# Altium PCB Thunderbolt3.pcbdoc (part 1 of 5)
Units mm, origin at the board's own origin, x right, y up, seen from the top; angles counter-clockwise.
Board outline 43.92 x 41.77 mm, 6 copper layers (TopLayer, MidLayer1, MidLayer2, MidLayer3, MidLayer4, BottomLayer); 211 components, 193 nets, 1132 pads, 744 vias.
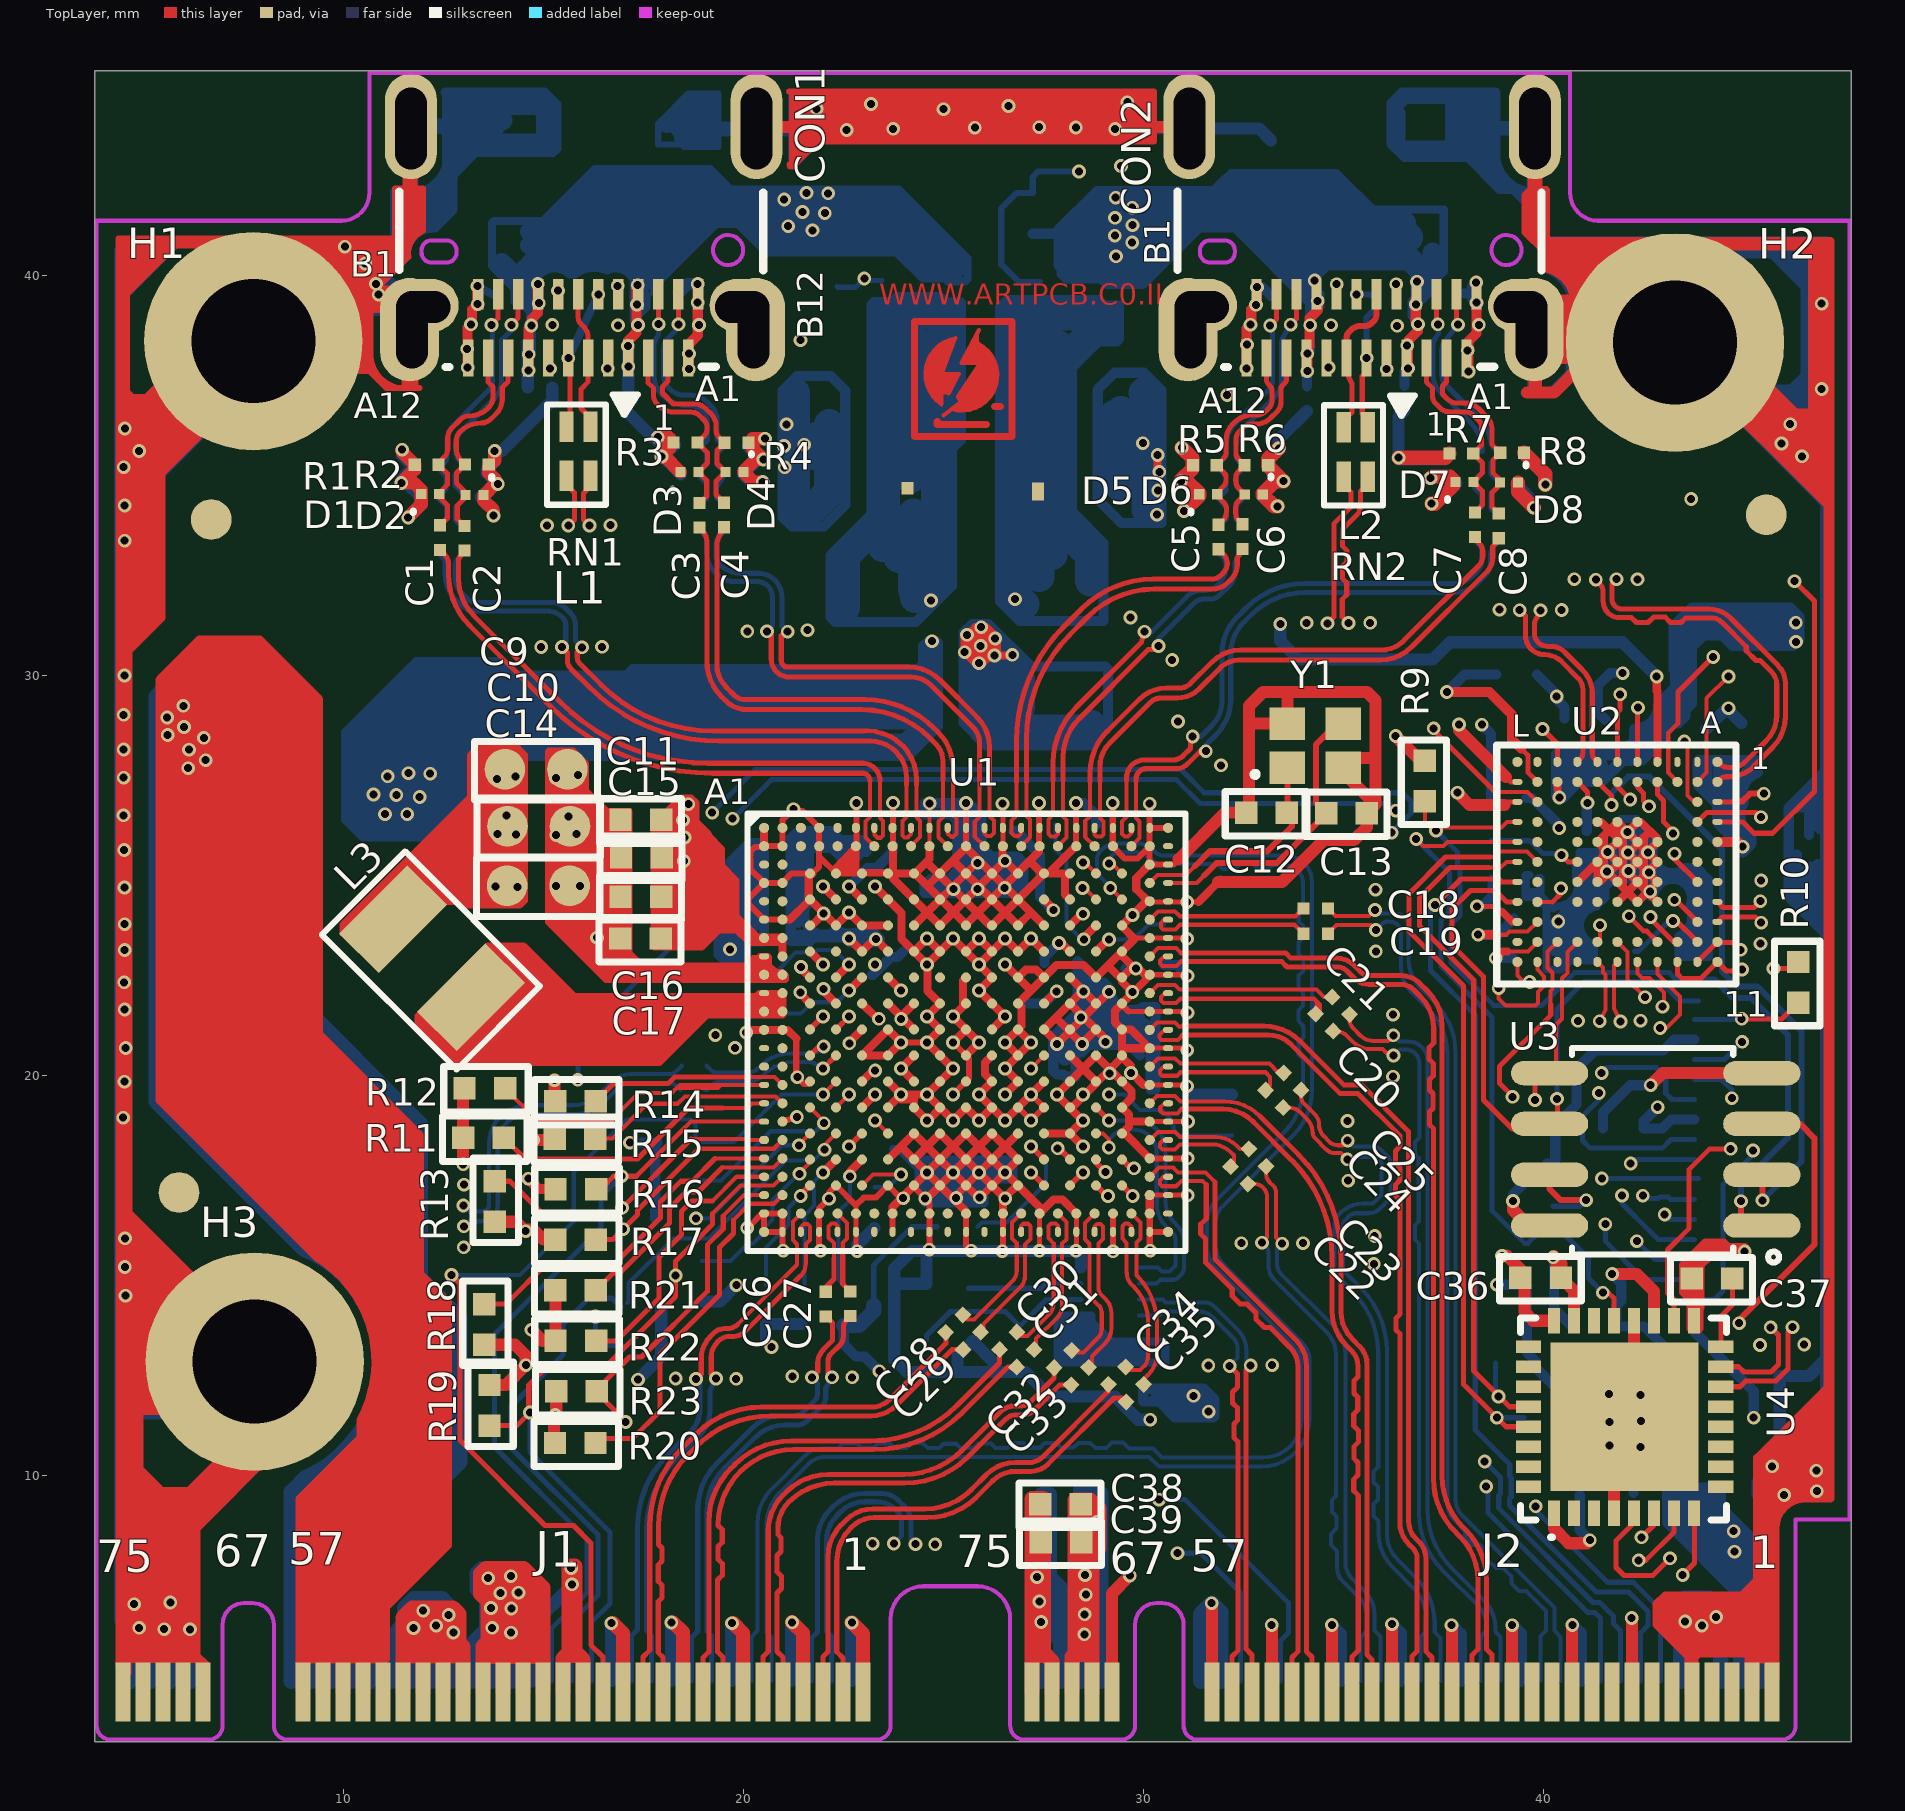
[diagram p0: TopLayer view]
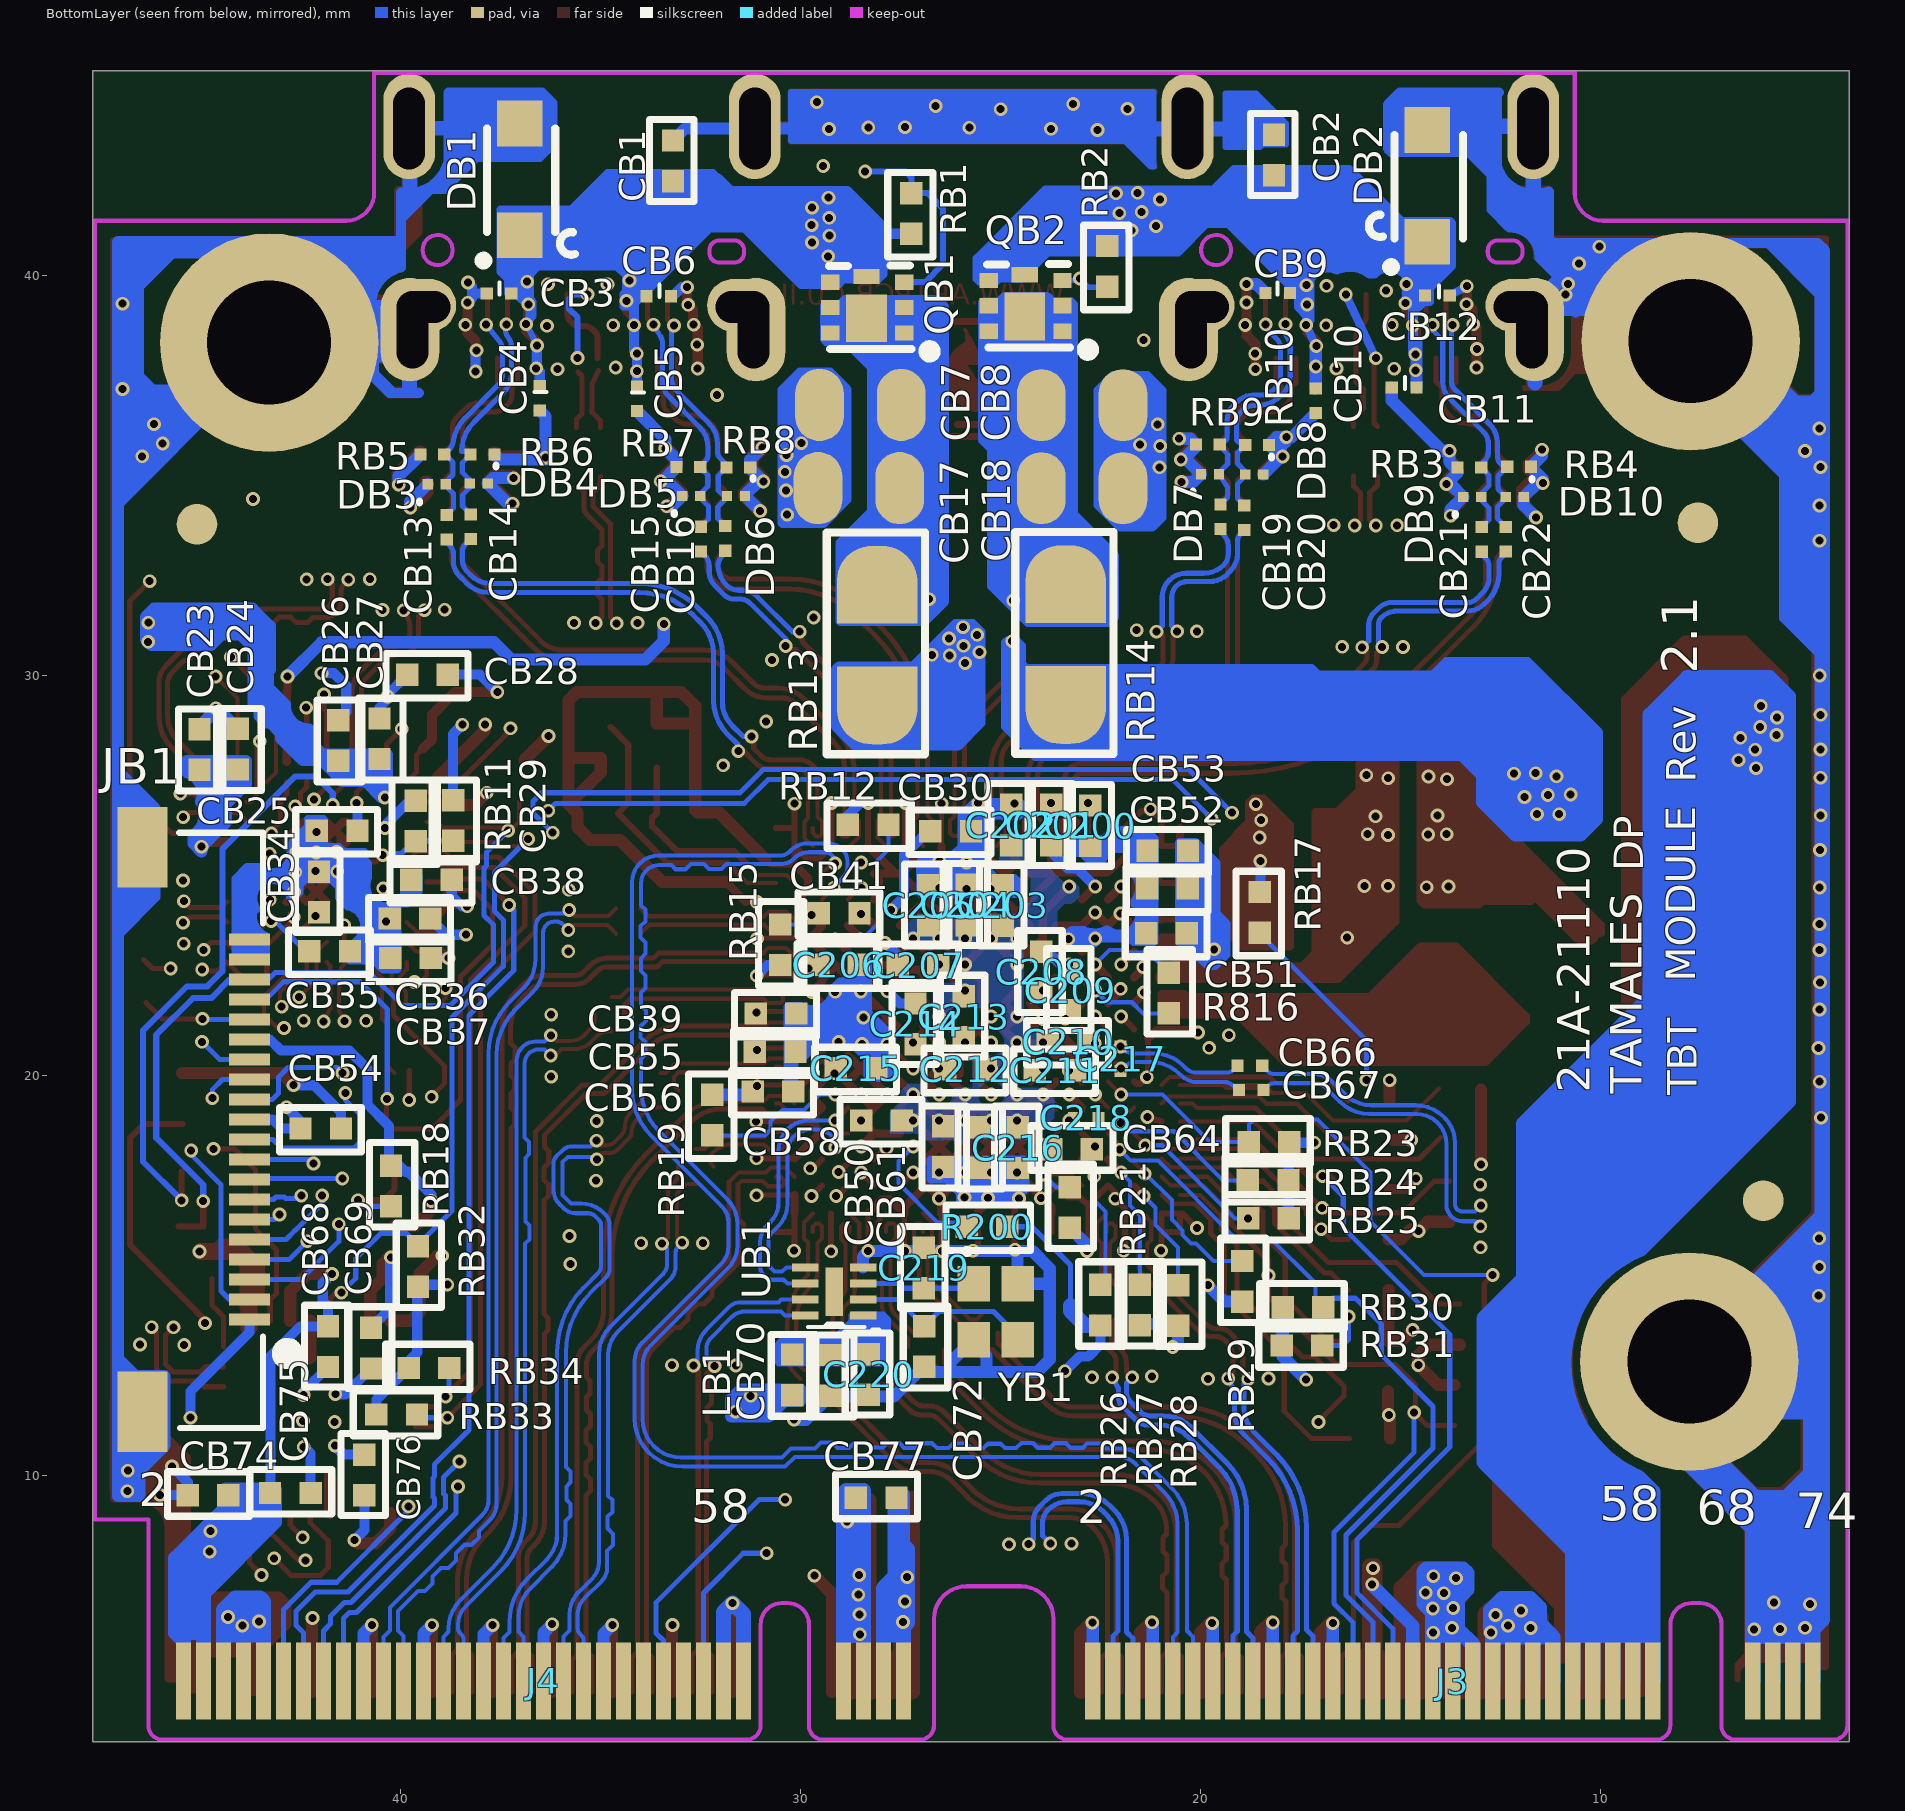
[diagram p1: BottomLayer view, seen from below]
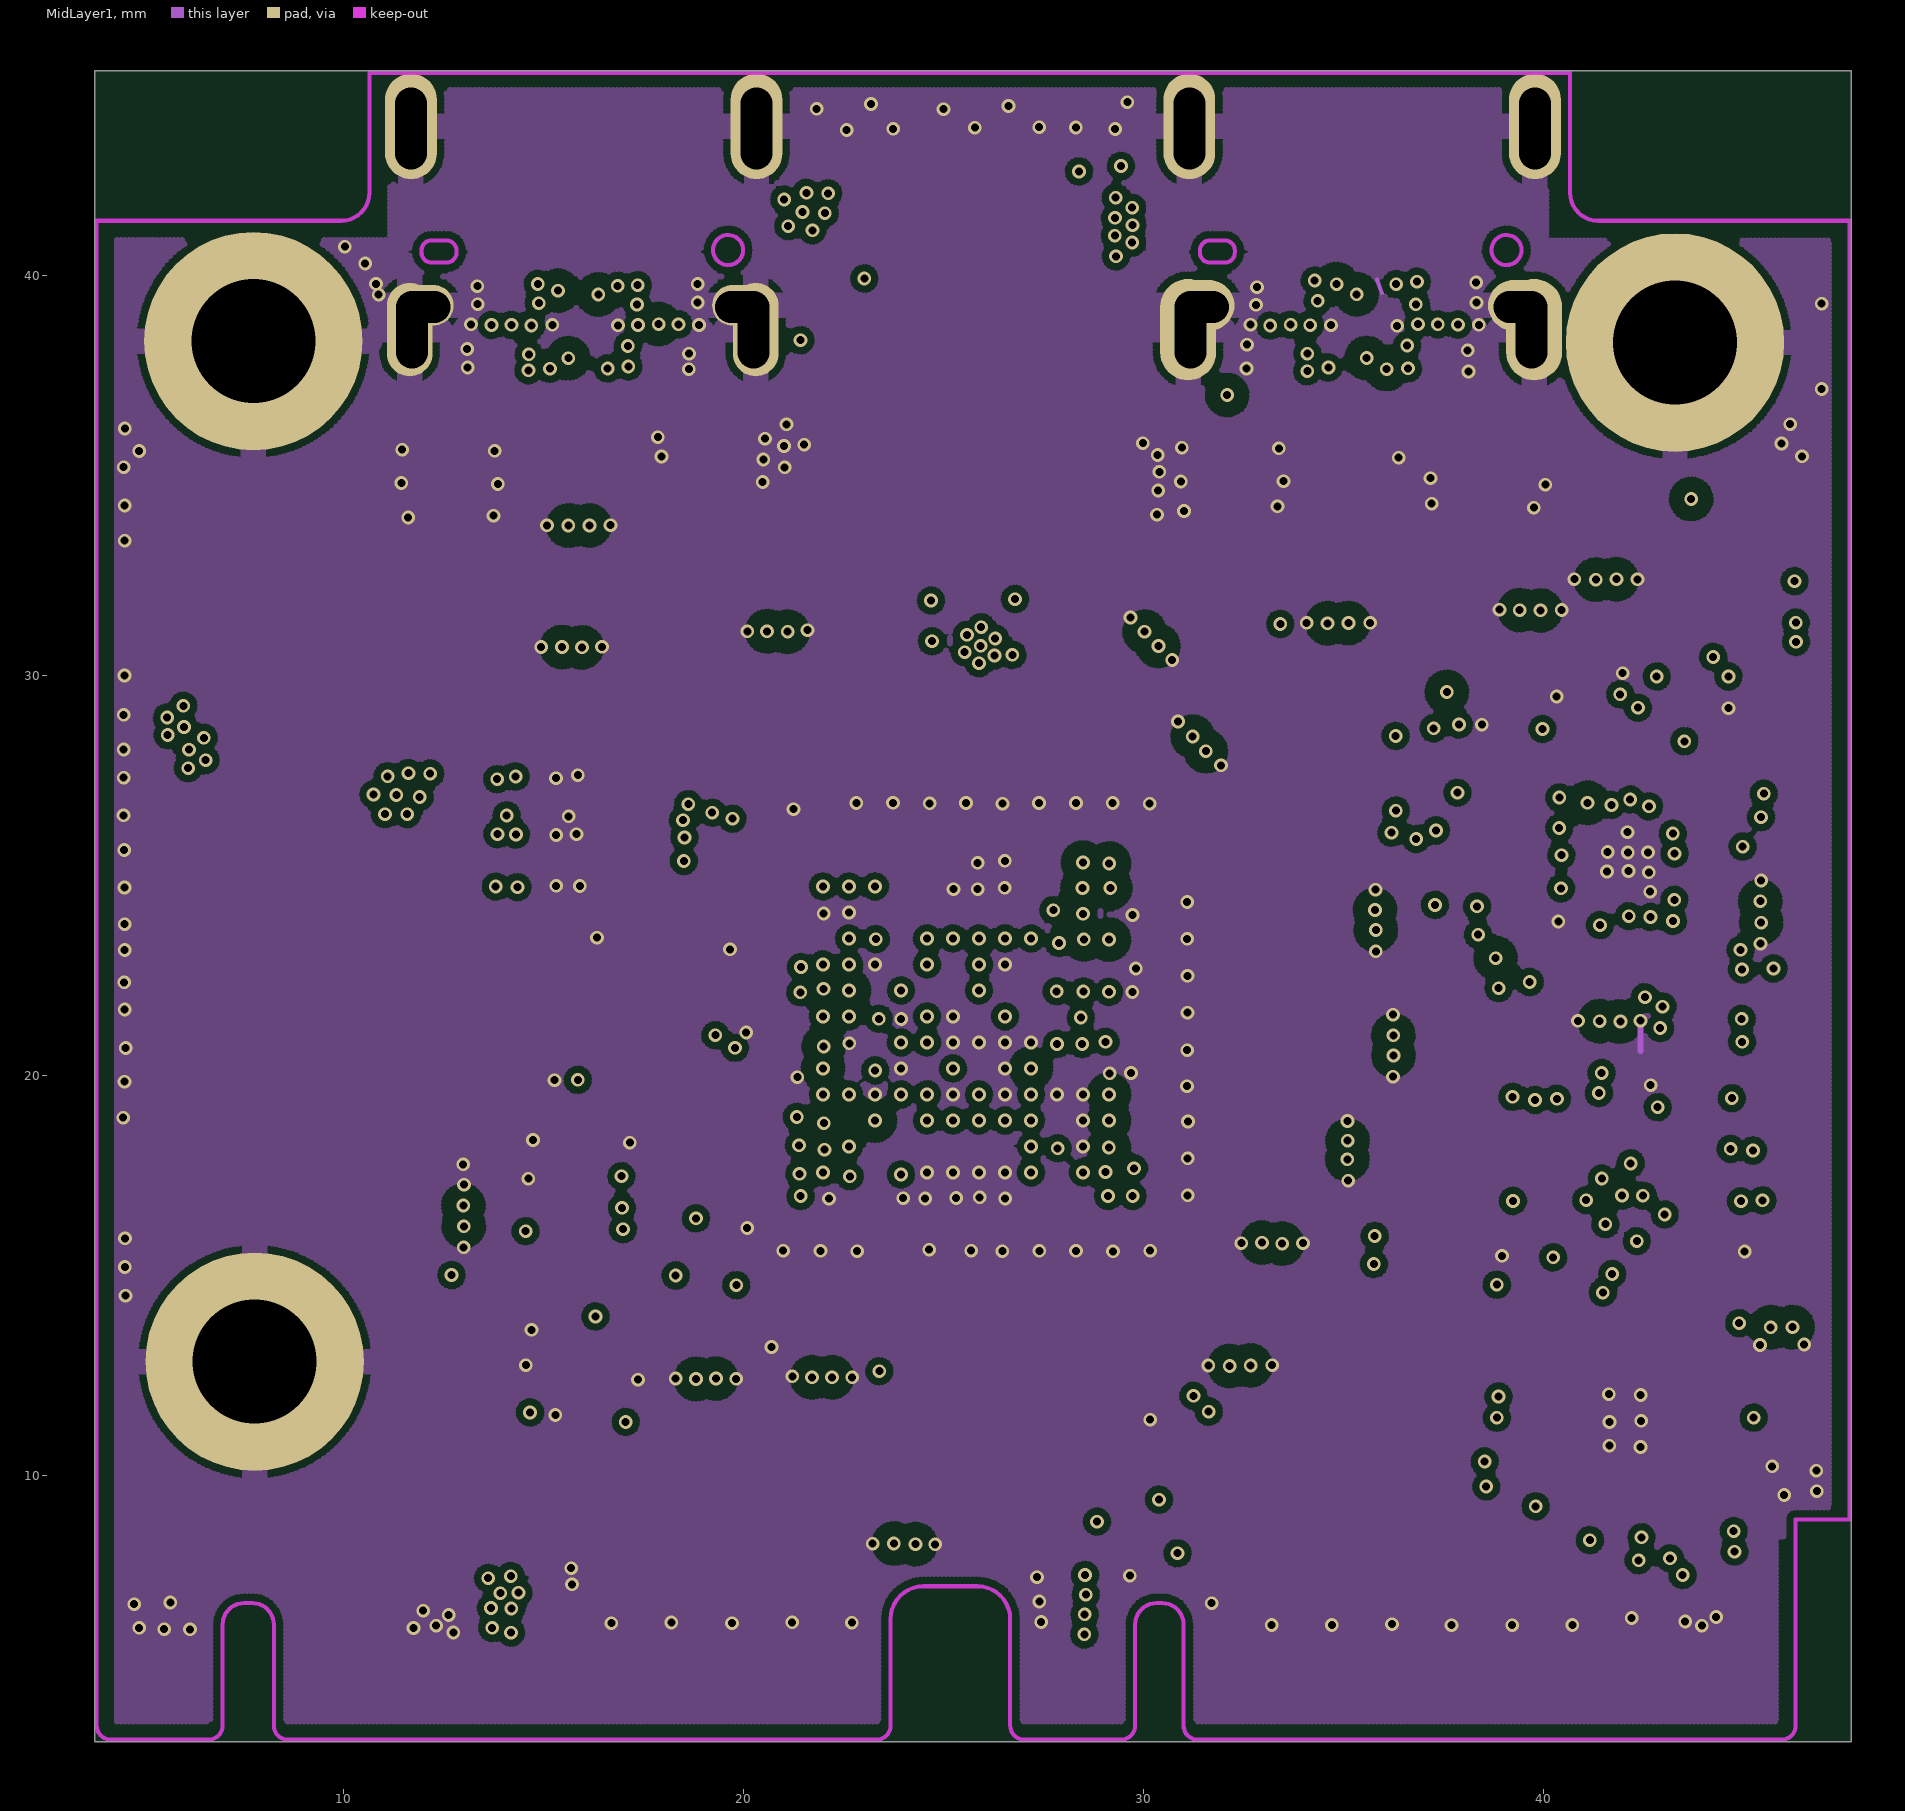
[diagram p2: MidLayer1]
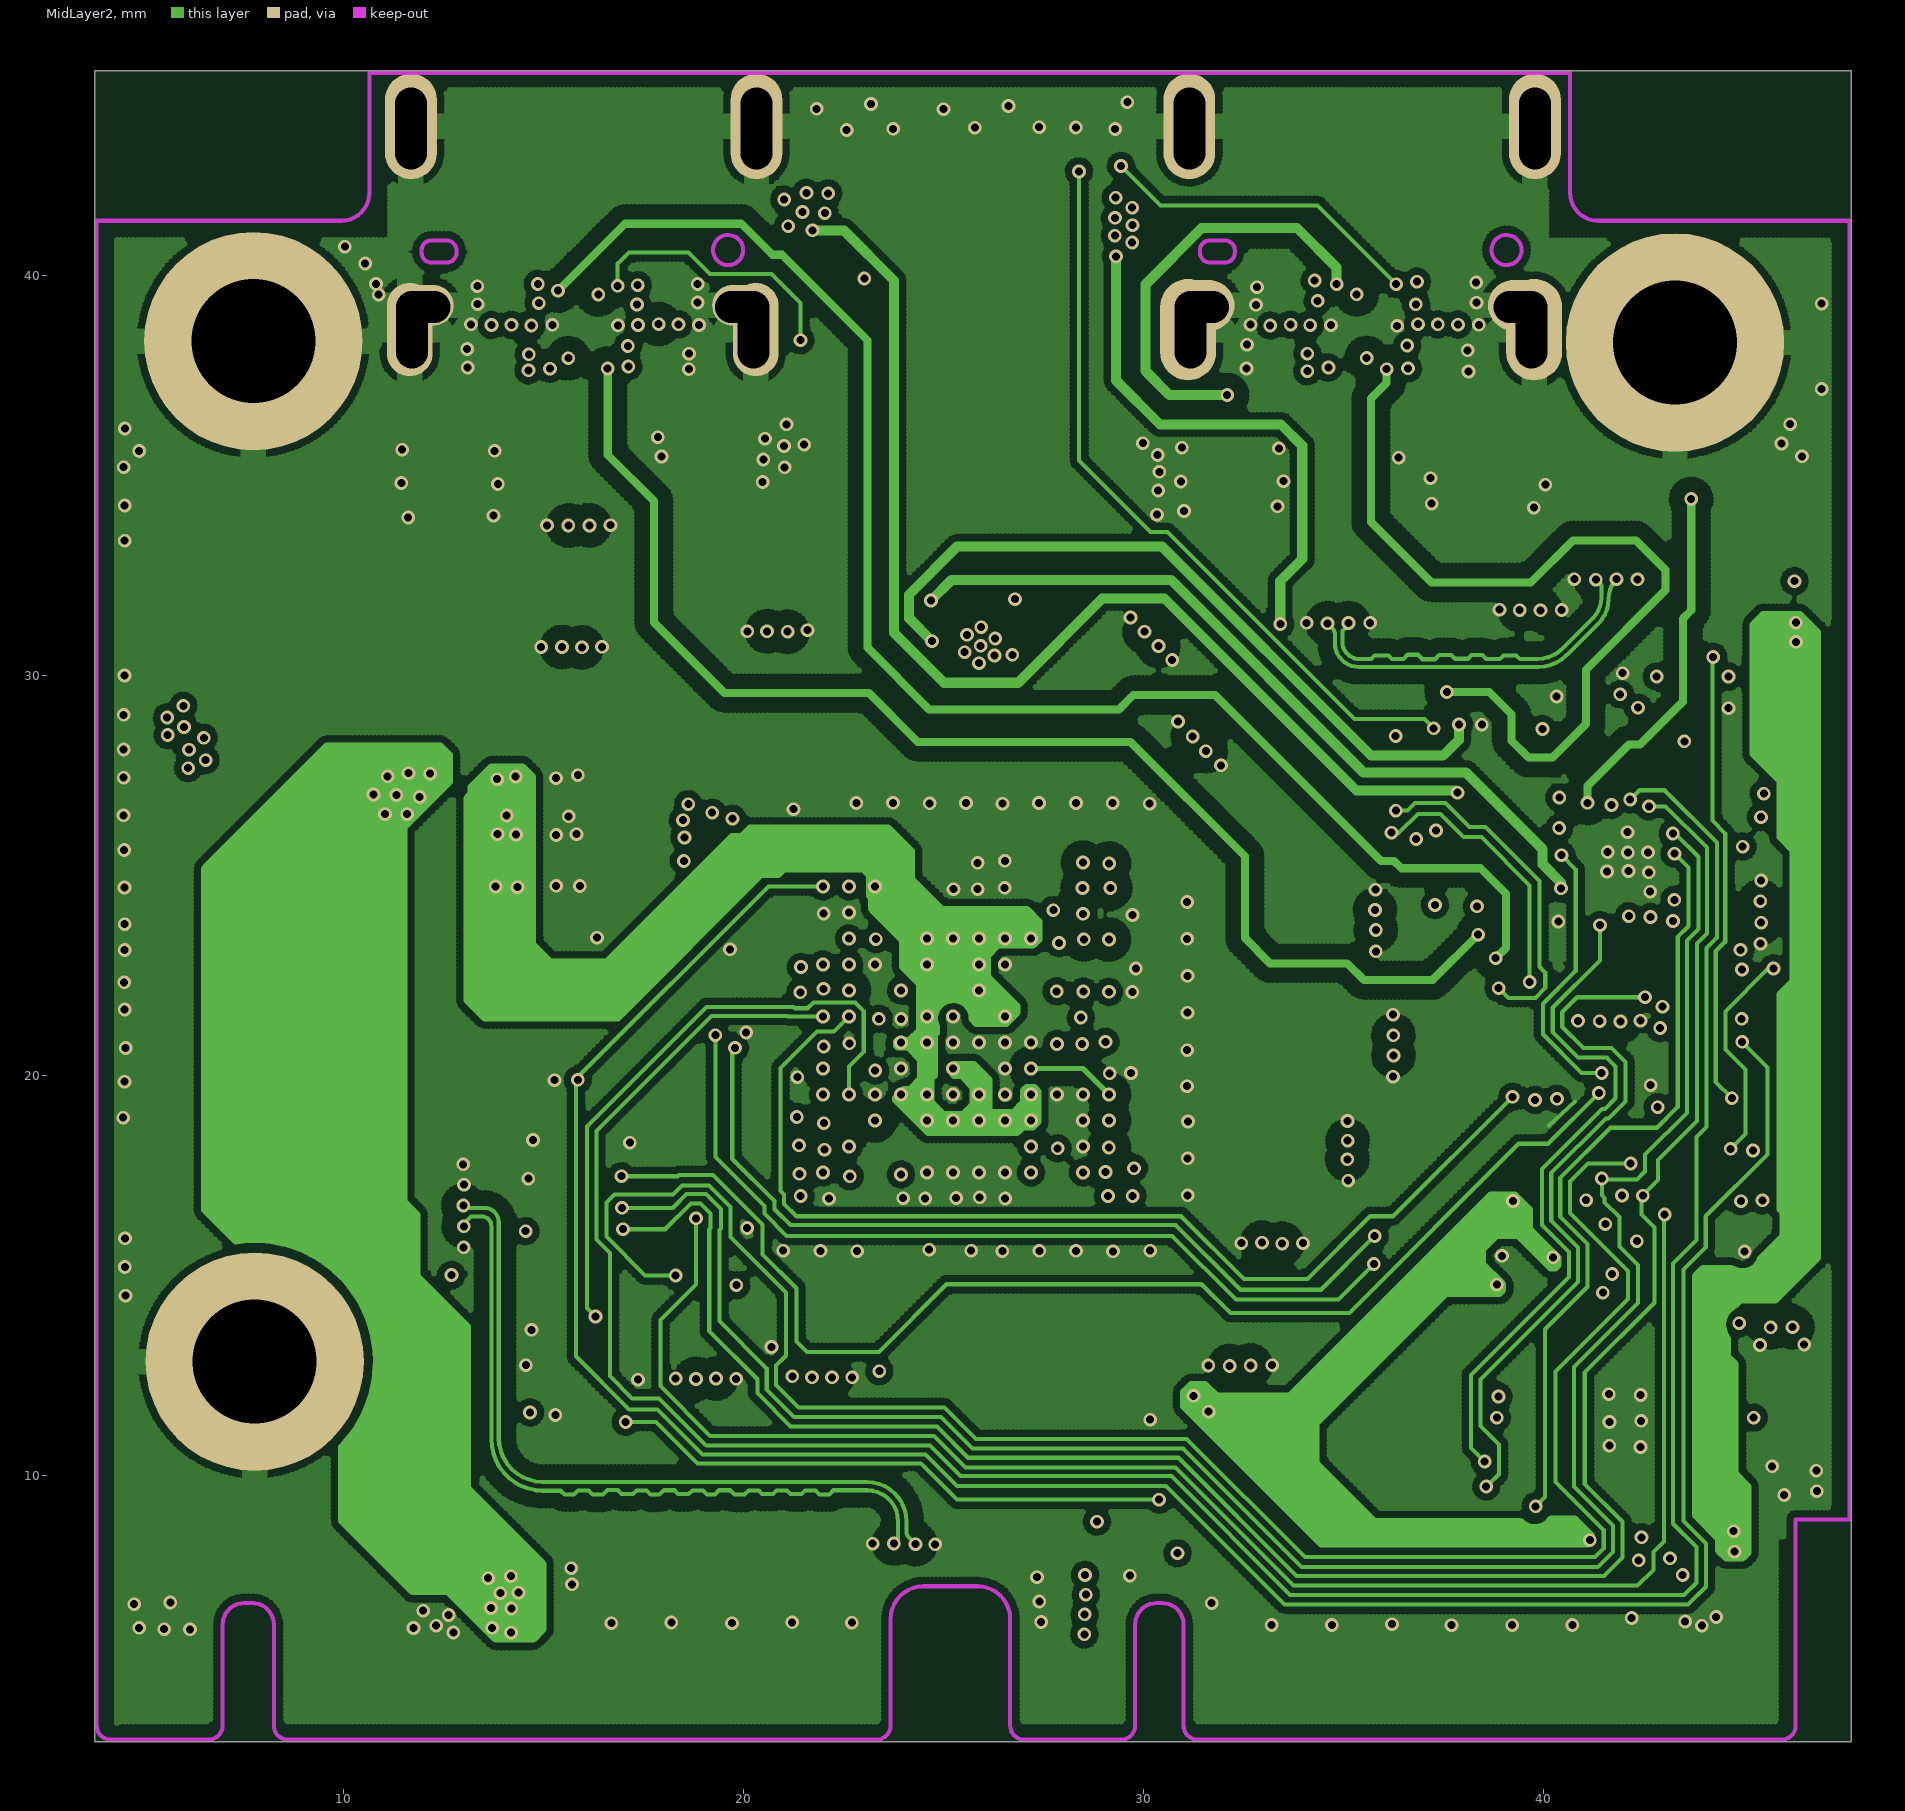
[diagram p3: MidLayer2]
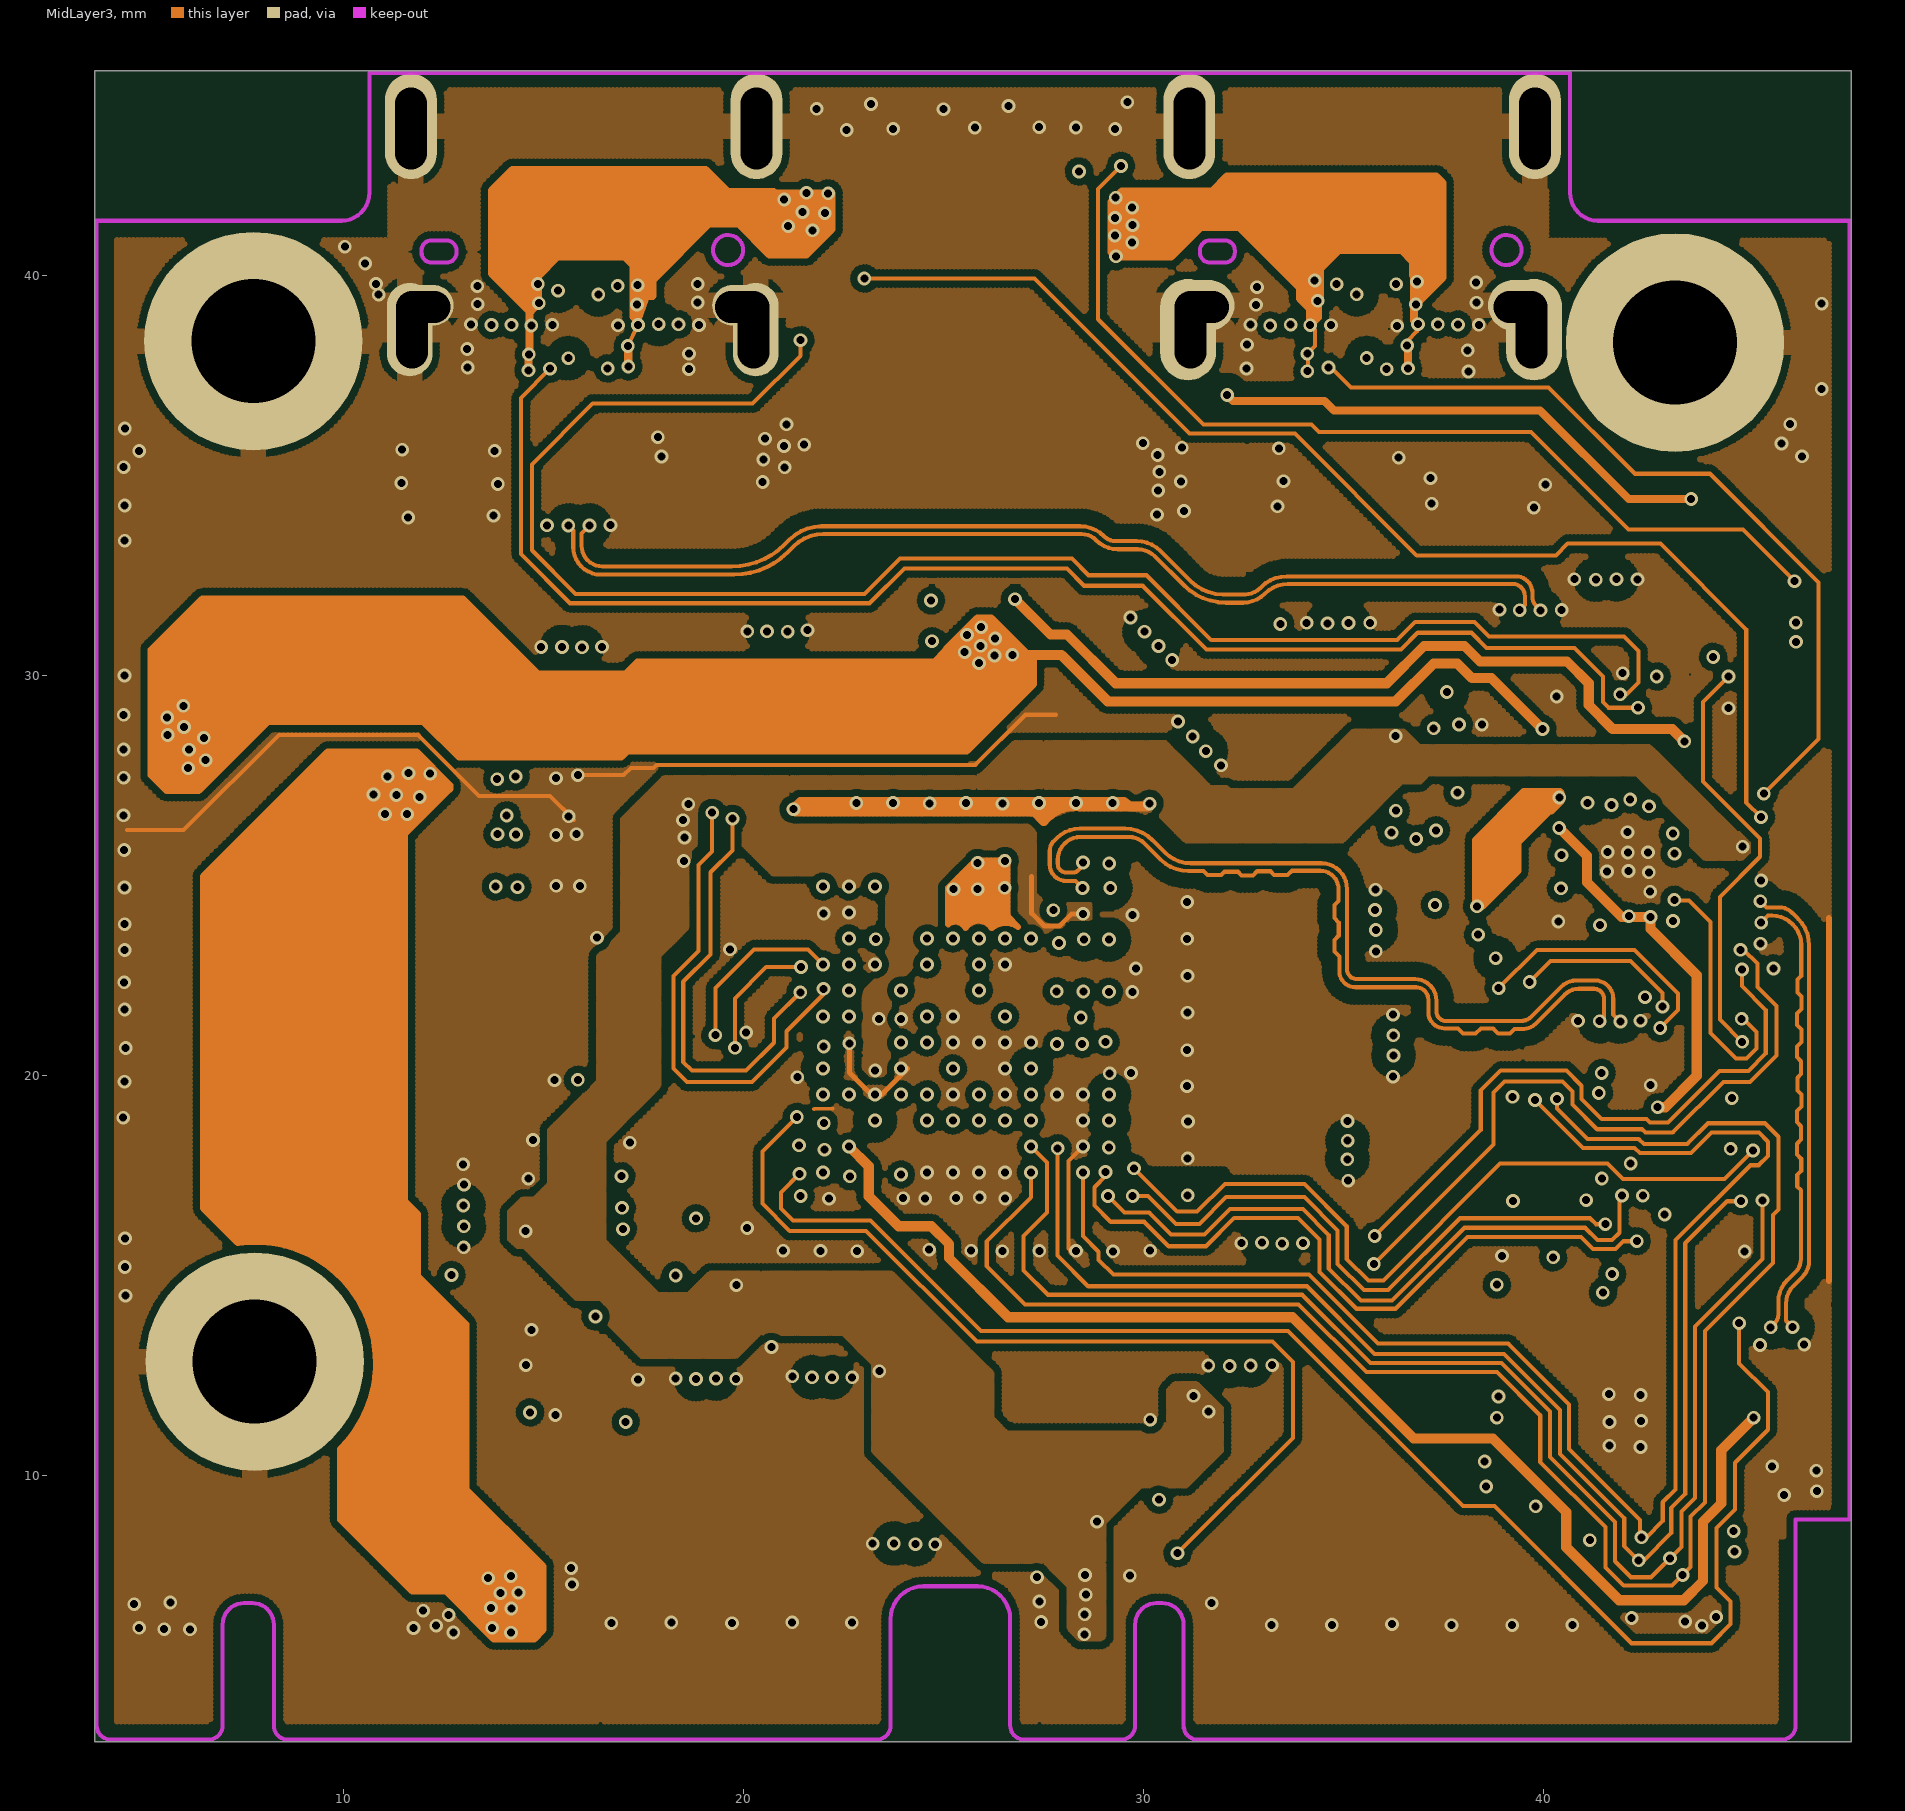
[diagram p4: MidLayer3]
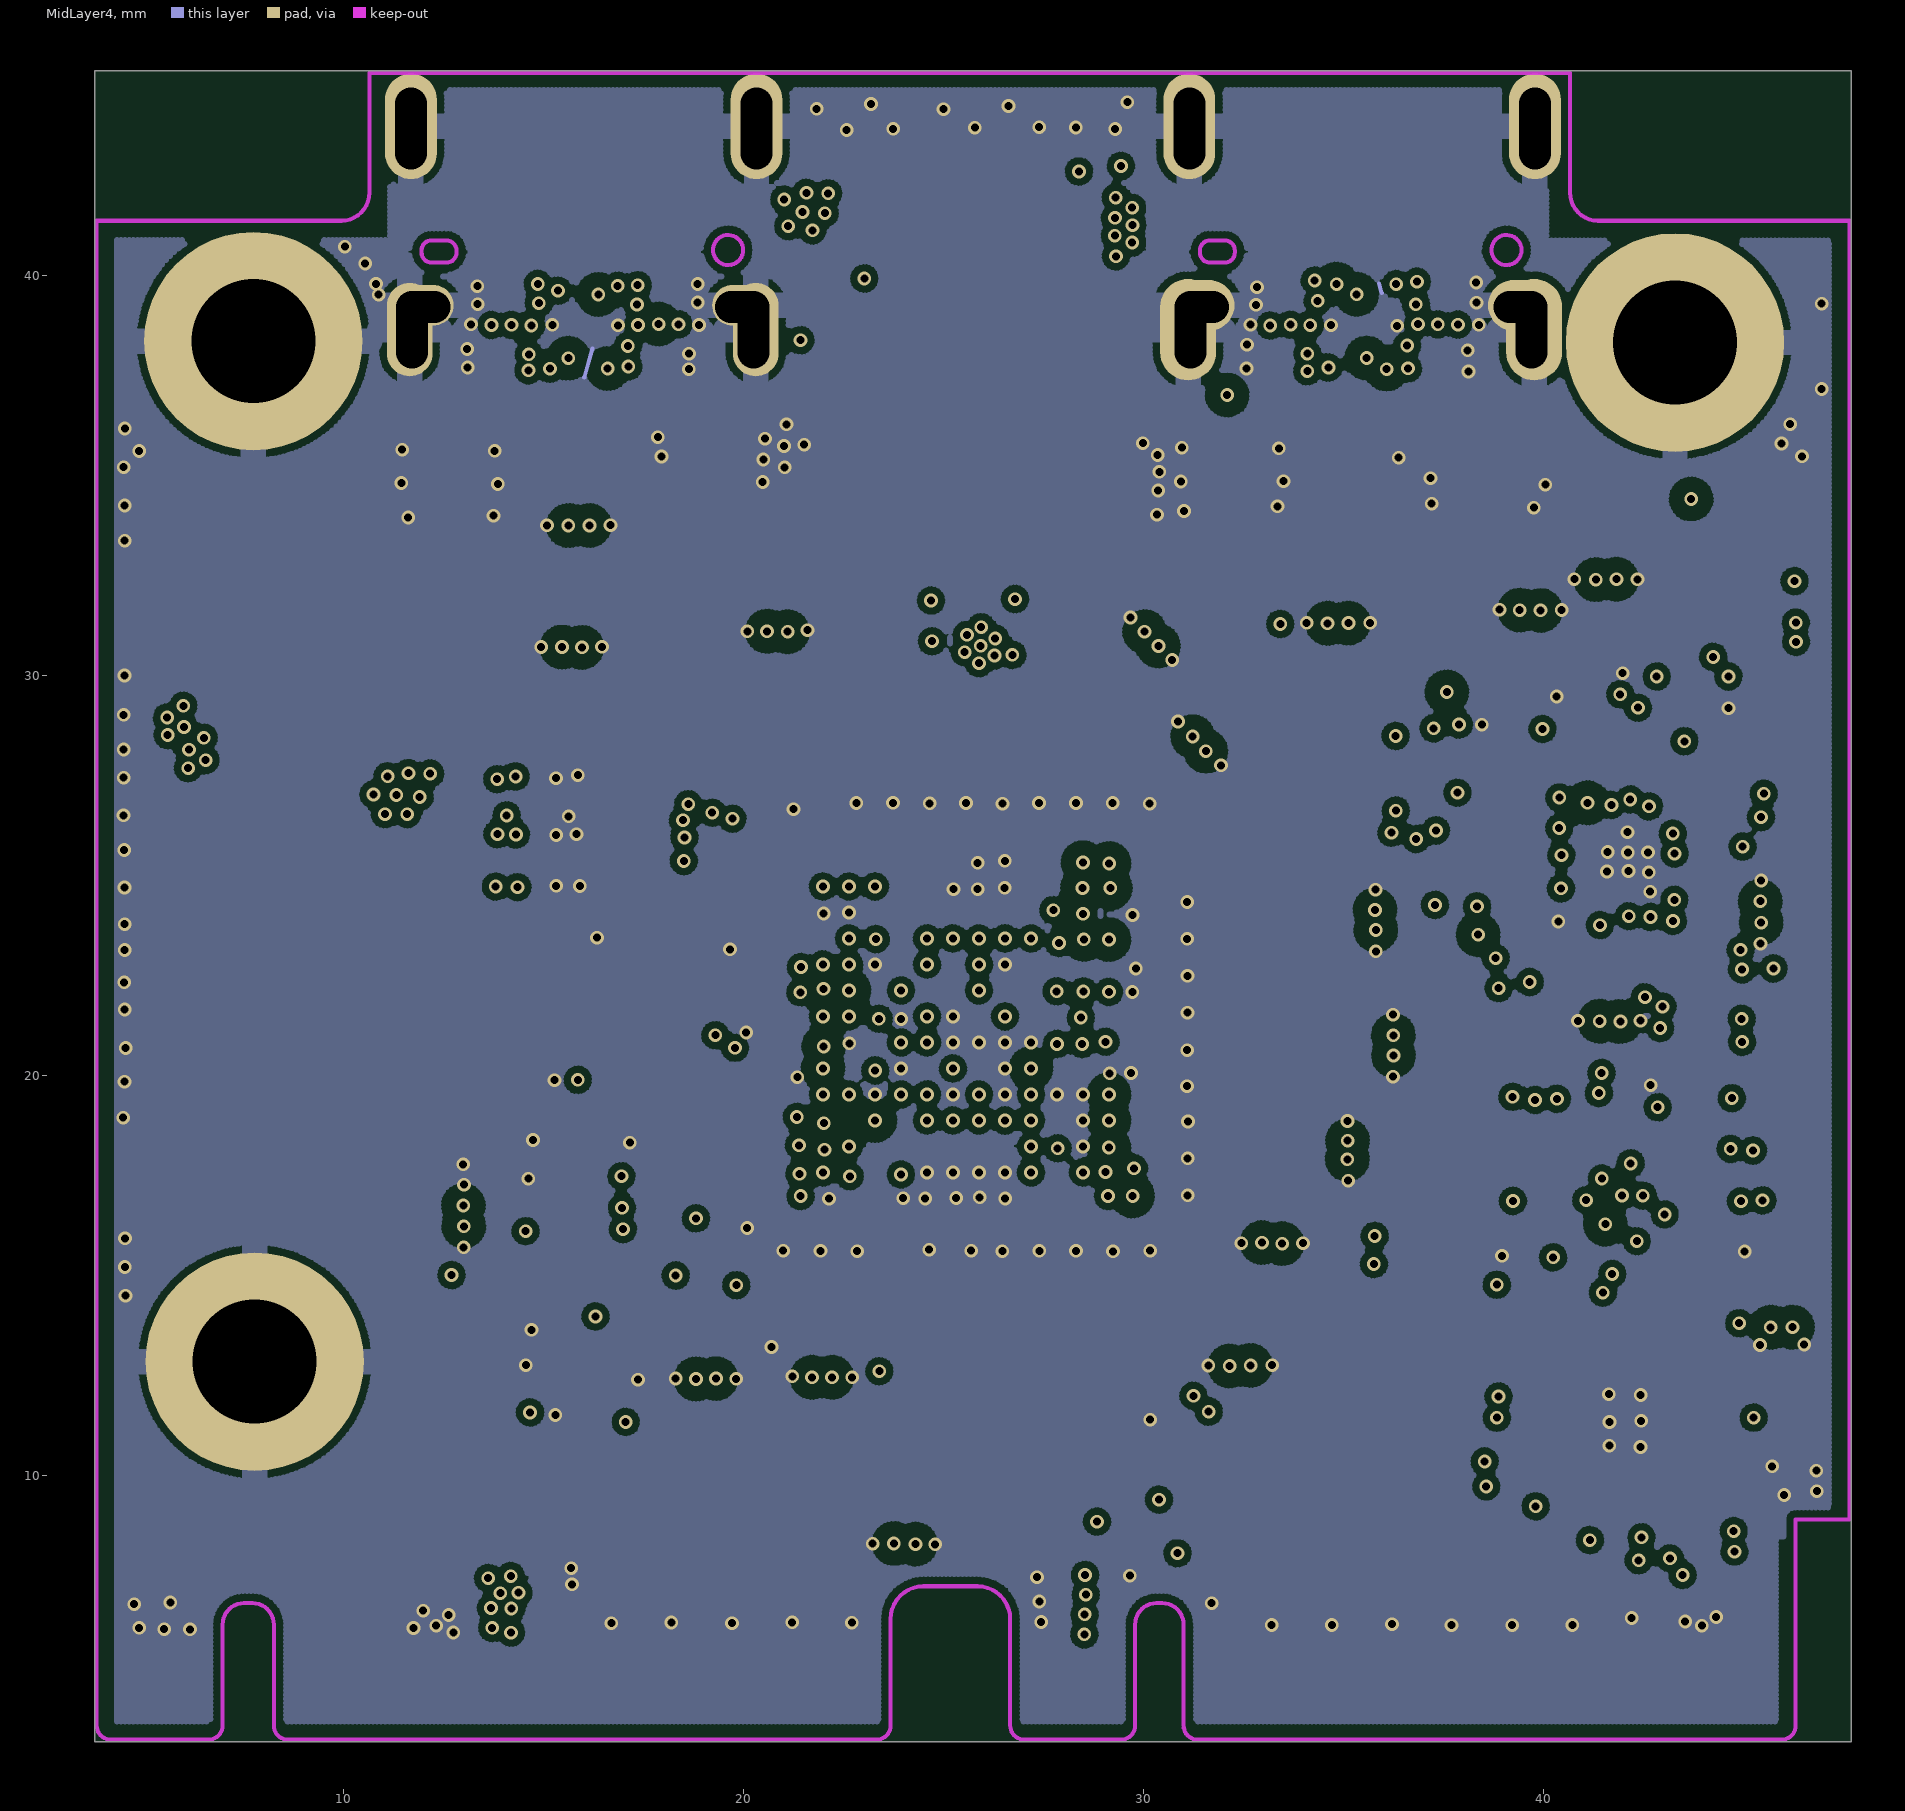
[diagram p5: MidLayer4]

## Layer stack, top to bottom
TopSolder: solder mask 0.0102, Solder Resist, Dk 3.5
TopLayer: signal copper 0.0356
Dielectric1: dielectric 0.32, FR-4, Dk 4.8
MidLayer1: signal copper 0.0356
Dielectric2: dielectric 0.32, FR-4, Dk 4.8
MidLayer2: signal copper 0.0356
Dielectric3: dielectric 0.32, FR-4, Dk 4.8
MidLayer3: signal copper 0.0356
Dielectric4: dielectric 0.32, FR-4, Dk 4.8
MidLayer4: signal copper 0.0356
Dielectric5: dielectric 0.32, FR-4, Dk 4.8
BottomLayer: signal copper 0.0356
BottomSolder: solder mask 0.0102, Solder Resist, Dk 3.5

## Board outline
3.774,3.357 47.693,3.357 47.693,45.129 3.774,45.129

## Design rules (kind name [scope] priority, off if disabled: settings)
Clearance Clearance_1 [InNet('GND') vs InNetClass('15')] p1: gap=0.381 ignorepadtopadclearanceinfootprint=FALSE except(0: Arc-Hole Track-Hole SMDPad-Hole THPad-Hole Via-Hole Fill-Hole Poly-Hole Region-Hole Text-Hole)
Clearance [All] p2: gap=0.178 ignorepadtopadclearanceinfootprint=FALSE except(0: Arc-Hole Track-Hole SMDPad-Hole THPad-Hole Via-Hole Fill-Hole Poly-Hole Region-Hole Text-Hole)
FabricationTestPointUsage TestPointUsage [All] p1: valid=0 allowmultiple=FALSE
FabricationTestpoint Testpoint [(IsPad And (OnTopLayer Or OnBottomLayer))] p1: side=3 testpointundercomponent=TRUE minsize=1.016 maxsize=2.54 preferedsize=1.524 minholesize=0.508 maxholesize=1.016 preferedholesize=0.813 testpointgrid=0.025 allowsidetop=TRUE allowsidebottom=TRUE usegrid=TRUE gridtolerance=0
FanoutControl Fanout_Small [All] p1 off: bgadir=Out bgaviamode=Centered fanoutstyle=Auto fanoutdirection=Alternating viagrid=0.025 // Protel DXP Scope 1 Expression Was: (CompPinCount < 5)   Fanout_Small (Default Rule)
FanoutControl Fanout_Default [All] p2: bgadir=Out bgaviamode=Centered fanoutstyle=Auto fanoutdirection=Alternating viagrid=0.025 // Fanout_Default (Default Rule)
FanoutControl Fanout_SOIC [All] p3 off: bgadir=Out bgaviamode=Centered fanoutstyle=Auto fanoutdirection=Alternating viagrid=0.025 // Protel DXP Scope 1 Expression Was: IsSOIC   Fanout_SOIC (Default Rule)
FanoutControl Fanout_BGA [All] p4 off: bgadir=Out bgaviamode=Centered fanoutstyle=Auto fanoutdirection=Alternating viagrid=0.025 // Protel DXP Scope 1 Expression Was: IsBGA   Fanout_BGA (Default Rule)
FanoutControl Fanout_LCC [All] p5 off: bgadir=Out bgaviamode=Centered fanoutstyle=Auto fanoutdirection=Alternating viagrid=0.025 // Protel DXP Scope 1 Expression Was: IsLCC   Fanout_LCC (Default Rule)
PolygonConnect [All] p1: connectstyle=Relief reliefconductorwidth=0.635 reliefentries=4 polygonreliefangle="90 Angle" airgapwidth=0.254
RoutingLayers [All] p1: top layer_v5=TRUE mid layer 1_v5=FALSE mid layer 2_v5=FALSE mid layer 3_v5=FALSE mid layer 4_v5=FALSE bottom layer_v5=TRUE
RoutingVias [All] p1: holewidth=0.711 width=1.27 viastyle="Through Hole" minholewidth=0.711 minwidth=1.27 maxholewidth=0.711 maxwidth=1.27
SolderMaskExpansion [All] p1: expansion=0.051 istentingtop=FALSE
Width [All] p1: maxlimit=0.254 minlimit=0.254 preferedwidth=0.254
22 further rules are at their usual default settings.

## Components (designator, comment, footprint, x,y, rotation, side; value= is the part's Value field where it differs from the comment)
C1 "330nF" 0201C#1 12.408,33.148 r180 top
C2 "330nF" 0201C#1 13.018,33.133 r180 top
C3 "220nF" 0201C#1 18.898,33.706 r180 top
C4 "220nF" 0201C#1 19.51,33.713 r180 top
C5 "330nF" 0201C#1 31.873,33.163 r180 top
C6 "330nF" 0201C#1 32.473,33.173 r180 top
C7 "220nF" 0201C#1 38.28,33.468 r180 top
C8 "220nF" 0201C#1 38.878,33.441 r180 top
C9 "33uF" 0603C 14.03,27.663 r90 top
C10 "33uF" 0603C 14.095,26.243 r90 top
C11 "10uF" 0402C#1 16.92,26.401 r90 top
C12 "22pF" 0402C#1 32.565,26.581 r90 top
C13 "22pF" 0402C#1 34.56,26.568 r90 top
C14 "33uF" 0603C 14.085,24.756 r90 top
C15 "10uF" 0402C#1 16.933,25.466 r90 top
C16 "10uF" 0402C#1 16.92,24.478 r90 top
C17 "10uF" 0402C#1 16.91,23.433 r90 top
C18 "220nF" 0201C#1 33.993,24.186 r90 top
C19 "220nF" 0201C#1 33.993,23.553 r90 top
C20 "220nF" 0201C#1 34.3,21.551 r45 top
C21 "220nF" 0201C#1 34.71,21.971 r45 top
C22 "220nF" 0201C#1 32.17,17.733 r45 top
C23 "220nF" 0201C#1 32.628,18.173 r45 top
C24 "220nF" 0201C#1 33.048,19.641 r45 top
C25 "220nF" 0201C#1 33.498,20.076 r45 top
C26 "220nF" 0201C#1 22.053,13.986 r180 top
C27 "220nF" 0201C#1 22.663,13.996 r180 top
C28 "220nF" 0201C#1 25.045,13.588 r135 top
C29 "220nF" 0201C#1 25.485,13.158 r135 top
C30 "220nF" 0201C#1 26.395,13.158 r135 top
C31 "220nF" 0201C#1 26.823,12.721 r135 top
C32 "220nF" 0201C#1 27.76,12.703 r135 top
C33 "220nF" 0201C#1 28.188,12.276 r135 top
C34 "220nF" 0201C#1 29.115,12.288 r135 top
C35 "220nF" 0201C#1 29.56,11.851 r135 top
C36 "1uF" 0402C#1 39.418,14.953 r90 top
C37 "1uF" 0402C#1 43.7,14.936 r90 top
C38 "10uF" 0402C#1 27.413,9.293 r90 top
C39 "1uF" 0402C#1 27.423,8.343 r90 top
C200 "1uF" 0402C#2 22.753,26.76 r0 bottom
C201 "1uF" 0402C#2 23.73,26.781 r0 bottom
C202 "1uF" 0402C#2 24.728,26.778 r0 bottom
C203 "1uF" 0402C#2 24.94,24.77 r0 bottom
C204 "1uF" 0402C#2 25.85,24.783 r0 bottom
C205 "1uF" 0402C#2 26.81,24.773 r0 bottom
C206 "1uF" 0402C#2 29.558,22.775 r270 bottom
C207 "1uF" 0402C#2 27.568,22.77 r270 bottom
C208 "1uF" 0402C#2 23.983,23.105 r0 bottom
C209 "1uF" 0402C#2 23.26,22.653 r0 bottom
C210 "1uF" 0402C#2 23.815,20.858 r270 bottom
C211 "1uF" 0402C#2 24.14,20.143 r270 bottom
C212 "1uF" 0402C#2 26.383,20.163 r270 bottom
C213 "1uF" 0402C#2 25.92,21.988 r0 bottom
C214 "1uF" 0402C#2 27.125,21.808 r0 bottom
C215 "1uF" 0402C#2 29.12,20.188 r270 bottom
C216 "1uF" 0402C#2 24.563,18.713 r0 bottom
C217 "NC" 0201C#2 22,20.735 r0 bottom
C218 "NC" 0201C#2 23.163,18.948 r270 bottom
C219 "22pF" 0402C#2 26.915,15.706 r0 bottom
C220 "1uF" 0402C#2 28.295,13.043 r0 bottom
CB1 "1uF" 0402C#2 33.185,43.383 r0 bottom
CB2 "1uF" 0402C#2 18.16,43.528 r0 bottom
CB3 "10nF" 0201C#2 37.843,39.56 r270 bottom
CB4 "10nF" 0201C#2 36.518,36.633 r180 bottom
CB5 "10nF" 0201C#2 34.085,36.62 r180 bottom
CB6 "10nF" 0201C#2 33.848,39.49 r270 bottom
CB7 "22uF" 0805C 29.523,36.773 r0 bottom
CB8 "22uF" 0805C 23.978,36.768 r0 bottom
CB9 "10nF" 0201C#2 17.758,39.57 r90 bottom
CB10 "10nF" 0201C#2 17.115,36.57 r180 bottom
CB11 "10nF" 0201C#2 15.215,37.21 r270 bottom
CB12 "10nF" 0201C#2 13.768,39.505 r90 bottom
CB13 "330nF" 0201C#2 38.843,33.405 r180 bottom
CB14 "330nF" 0201C#2 38.24,33.418 r180 bottom
CB15 "220nF" 0201C#2 32.488,33.113 r180 bottom
CB16 "220nF" 0201C#2 31.878,33.128 r180 bottom
CB17 "22uF" 0805C 29.56,34.695 r0 bottom
CB18 "22uF" 0805C 23.978,34.69 r0 bottom
CB19 "330nF" 0201C#2 19.498,33.668 r180 bottom
CB20 "330nF" 0201C#2 18.903,33.643 r180 bottom
CB21 "220nF" 0201C#2 12.965,33.103 r180 bottom
CB22 "220nF" 0201C#2 12.365,33.108 r180 bottom
CB23 "1uF" 0402C#2 45.025,27.653 r180 bottom
CB24 "10uF" 0402C#2 44.066,27.66 r180 bottom
CB25 "330pF" 0402C#2 42.09,26.128 r270 bottom
CB26 "10uF" 0402C#2 41.553,27.878 r180 bottom
CB27 "1uF" 0402C#2 40.523,27.921 r180 bottom
CB28 "330pF" 0402C#2 39.831,30.03 r270 bottom
CB29 "100nF" 0402C#2 38.683,25.878 r180 bottom
CB30 "1uF" 0402C#2 26.753,26.118 r270 bottom
CB34 "1uF" 0402C#2 42.038,25.103 r0 bottom
CB35 "1uF" 0402C#2 42.275,23.115 r270 bottom
CB36 "330pF" 0402C#2 40.27,23.935 r270 bottom
CB37 "1uF" 0402C#2 40.255,22.946 r270 bottom
CB38 "1uF" 0402C#2 39.733,24.906 r270 bottom
CB39 "1uF" 0402C#2 31.12,21.558 r270 bottom
CB41 "1uF" 0402C#2 29.538,24.065 r270 bottom
CB50 "1uF" 0402C#2 26.435,17.723 r180 bottom
CB51 "1uF" 0402C#2 21.353,23.563 r270 bottom
CB52 "10uF" 0402C#2 21.328,24.693 r270 bottom
CB53 "10uF" 0402C#2 21.325,25.628 r270 bottom
CB54 "1uF" 0402C#2 42.5,18.686 r270 bottom
CB55 "1uF" 0402C#2 31.14,20.601 r270 bottom
CB56 "10uF" 0402C#2 31.19,19.61 r270 bottom
CB58 "1uF" 0402C#2 28.483,18.885 r270 bottom
CB61 "1uF" 0402C#2 25.533,17.703 r180 bottom
CB64 "1uF" 0402C#2 22.718,18.168 r90 bottom
CB66 "220nF" 0201C#2 19.07,20.253 r270 bottom
CB67 "220nF" 0201C#2 19.038,19.648 r270 bottom
CB68 "1uF" 0402C#2 41.813,13.738 r0 bottom
CB69 "1uF" 0402C#2 40.735,13.701 r0 bottom
CB70 "1uF" 0402C#2 29.243,12.006 r180 bottom
CB72 "22pF" 0402C#2 26.903,12.728 r180 bottom
CB74 "10uF" 0402C#2 44.303,9.518 r90 bottom
CB75 "1uF" 0402C#2 42.245,9.57 r90 bottom
CB76 "1uF" 0402C#2 40.903,10.531 r0 bottom
CB77 "1uF" 0402C#2 27.6,9.456 r90 bottom
CON1 "USB-307B" SMD-CON#1 18.613,37.946 r0 top
CON2 "USB-307B" SMD-CON#2 38.073,37.946 r0 top
D1 "" SOD882#1 12.39,34.543 r0 top
D2 "" SOD882#1 13.048,34.523 r180 top
D3 "" SOD882#1 18.868,35.093 r0 top
D4 "" SOD882#1 19.543,35.101 r180 top
D5 "" SOD882#1 31.838,34.541 r0 top
D6 "" SOD882#1 32.528,34.536 r180 top
D7 "" SOD882#1 38.243,34.848 r0 top
D8 "" SOD882#1 38.905,34.836 r180 top
DB1 "1N4007W" SOD12 37.018,43.808 r180 bottom
DB2 "1N4007W" SOD12 14.328,43.645 r180 bottom
DB3 "" SOD882#2 38.868,34.79 r0 bottom
DB4 "" SOD882#2 38.265,34.81 r180 bottom
DB5 "" SOD882#2 32.503,34.498 r0 bottom
DB6 "" SOD882#2 31.838,34.493 r180 bottom
DB7 "" SOD882#2 19.535,35.04 r0 bottom
DB8 "" SOD882#2 18.878,35.035 r180 bottom
DB9 "" SOD882#2 12.978,34.475 r0 bottom
DB10 "" SOD882#2 12.365,34.475 r180 bottom
J1 "NC" SMDJ1 22.98,4.598 r0 top
J2 "NC" SMDJ1 45.708,4.598 r0 top
J3 "NC" SMDJ2 22.69,4.868 r0 bottom
J4 "NC" SMDJ2 45.425,4.868 r0 bottom
JB1 "nc" SMD 43.773,13.911 r0 bottom
L3 "DFE322512F-R68M" 1210C 11.233,23.916 r45 top
LB1 "1.2uH" 0402C#2 30.203,12.018 r180 bottom
QB1 "BUK6D43-40PX" DFN6 27.408,38.573 r180 bottom
QB2 "BUK6D43-40PX" DFN6 23.45,38.615 r180 bottom
R1 "220K" 0201R#1 11.778,35.276 r0 top
R2 "220K" 0201R#1 13.033,35.283 r0 top
R3 "220K" 0201R#1 18.248,35.833 r0 top
R4 "220K" 0201R#1 19.523,35.826 r0 top
R5 "220K" 0201R#1 31.233,35.266 r0 top
R6 "220K" 0201R#1 32.518,35.266 r0 top
R7 "220K" 0201R#1 37.645,35.556 r0 top
R8 "220K" 0201R#1 38.915,35.576 r0 top
R9 "2.2K" 0402R#1 37.03,27.878 r0 top
R10 "0R" 0402R#1 46.36,22.846 r0 top
R11 "100K" 0402R#1 12.988,18.456 r90 top
R12 "100K" 0402R#1 13.02,19.688 r90 top
R13 "2.2K" 0402R#1 13.775,16.351 r180 top
R14 "100K" 0402R#1 15.29,19.368 r90 top
R15 "100K" 0402R#1 15.275,18.431 r90 top
R16 "100K" 0402R#1 15.295,17.168 r90 top
R17 "2.2K" 0402R#1 15.29,15.906 r90 top
R18 "100K" 0402R#1 13.518,13.278 r180 top
R19 "100K" 0402R#1 13.645,11.256 r180 top
R20 "100K" 0402R#1 15.281,10.823 r90 top
R21 "100K" 0402R#1 15.29,14.643 r90 top
R22 "100K" 0402R#1 15.295,13.376 r90 top
R23 "3K" 0402R#1 15.313,12.116 r90 top
R200 "2.2K" 0402R#2 25.845,16.228 r270 bottom
R816 "4.7K" 0402R#2 20.79,21.563 r180 bottom
RB1 "51K" 0402R#2 27.225,42.068 r0 bottom
RB2 "51K" 0402R#2 22.333,40.745 r0 bottom
RB3 "220K" 0201R#2 13.573,35.21 r0 bottom
RB4 "220K" 0201R#2 12.328,35.228 r0 bottom
RB5 "220K" 0201R#2 39.498,35.535 r0 bottom
RB6 "220K" 0201R#2 38.245,35.538 r0 bottom
RB7 "220K" 0201R#2 33.098,35.22 r0 bottom
RB8 "220K" 0201R#2 31.848,35.213 r0 bottom
RB9 "220K" 0201R#2 20.113,35.788 r0 bottom
RB10 "220K" 0201R#2 18.878,35.775 r0 bottom
RB11 "10K" 0402R#2 39.615,26.88 r0 bottom
RB12 "200R" 0402R#2 28.813,26.28 r270 bottom
RB13 "10mR" 1206R 28.083,29.16 r180 bottom
RB14 "10mR" 1206R 23.37,29.173 r180 bottom
RB15 "200R" 0402R#2 30.505,22.77 r180 bottom
RB17 "10K" 0402R#2 18.515,24.595 r0 bottom
RB18 "3K" 0402R#2 40.235,16.741 r180 bottom
RB19 "3K" 0402R#2 32.203,19.528 r0 bottom
RB21 "100K" 0402R#2 23.265,16.2 r180 bottom
RB23 "100K" 0402R#2 17.775,18.345 r90 bottom
RB24 "100K" 0402R#2 17.798,17.388 r90 bottom
RB25 "100K" 0402R#2 17.79,16.438 r90 bottom
RB26 "2.2K" 0402R#2 22.5,13.76 r180 bottom
RB27 "100R" 0402R#2 21.515,13.765 r180 bottom
RB28 "100K" 0402R#2 20.558,13.753 r180 bottom
RB29 "3K" 0402R#2 18.958,14.355 r180 bottom
RB30 "100K" 0402R#2 16.925,14.218 r90 bottom
RB31 "100K" 0402R#2 16.95,13.258 r90 bottom
RB32 "10K" 0402R#2 39.563,14.726 r180 bottom
RB33 "2.2K" 0402R#2 39.588,11.536 r90 bottom
RB34 "2.2K" 0402R#2 38.778,12.698 r90 bottom
RN1 "TCM1210H-900-2P-T000" 0402*2 16.173,36.233 r0 top
RN2 "TCM1210H-900-2P-T000" 0402*2 35.6,36.211 r0 top
U1 "JHL7440" BGA2 20.513,26.195 r0 top
U2 "CYPD5235-96BZXIT" BGA1 44.343,27.851 r0 top
U3 "P25Q80H-SSH-IT" SOP8 45.453,16.258 r0 top
U4 "CY7C65215-32LTXI" QFN32 40.255,9.068 r0 top
UB1 "丝印未找到对应型号" DFN8 28.433,14.008 r180 bottom
Y1 "25MHz" 2016X#1 33.593,27.708 r0 top
YB1 "25MHz" 2016X#2 25.673,14.801 r90 bottom

## Footprints (in the part's own frame and the unit in brackets; to place one, negate y for a bottom-side part, rotate by r counter-clockwise, add the part's x,y. Pads: shape width x height; smd on the part's side, far side on the other; paste and mask are expansions set on the pad)
0201C#1 [mil]
  rect 12x12 smd: 1(0,0) 2(0,-24.21)
0201C#2 [mil]
  rect 12x12 smd: 1(0,0) 2(0,24.21)
0201R#1 [mil]
  rect 12x12 smd: 1(0,0) 2(23.42,0)
0201R#2 [mil]
  rect 12x12 smd: 1(0,0) 2(-23.43,0)
0402*2 [mil]
  rect 14x30 smd: 1(0,0) 2(-23.62,0) 3(-23.62,-48.52) 4(0,-48.52)
  silkscreen extent -43,-77 46,32
0402C#1 [mil]
  rect 22x22 smd: 1(0,0) 2(0,-39.96)
  silkscreen extent -23,-60 21,21
0402C#2 [mil]
  rect 22x22 smd: 1(0,0) 2(0,39.96)
  silkscreen extent -21,-21 23,60
0402R#1 [mil]
  rect 22x22 smd: 1(0,0) 2(0,-39.96)
  silkscreen extent -23,-63 21,20
0402R#2 [mil]
  rect 22x22 smd: 1(0,0) 2(0,39.96)
  silkscreen extent -21,-20 23,63
0603C [mil]
  round 40 smd: 1(0,0) 2(0,-61.52)
  silkscreen extent -30,-91 27,30
0805C [mil]
  oval 48x71 smd: 1(0,0) 2(-80.41,0)
1206R [mil]
  oval 79x69 smd: 1(0,0) 2(0,126.57)
  rect 79x45 smd: 1(0,19.59) 2(0,106.99)
  silkscreen extent -50,-44 47,174
1210C [mil]
  rect 95x55 smd: 1(0,0) 2(0,-108.56)
  silkscreen extent -60,-149 56,39
2016X#1 [mil]
  rect 35x32 smd: 1(0,0) 2(55.12,0) 3(55.12,43.31) 4(0,43.31)
  silkscreen extent -35,-10 -28,-3
2016X#2 [mil]
  rect 35x32 smd: 1(0,0) 2(-55.12,0) 3(-55.12,-43.31) 4(0,-43.31)
  silkscreen extent 28,3 35,10
BGA1 [mil]
  round 10 smd: A1(0,0) A2(0,-19.68) A5(0,-78.74) A10(0,-177.17) A11(0,-196.85) B2(-19.69,-19.68) B3(-19.69,-39.37) B4(-19.69,-59.06) B5(-19.69,-78.74) B6(-19.69,-98.43) B7(-19.69,-118.11) B8(-19.69,-137.79) B9(-19.69,-157.48) B10(-19.69,-177.17) C2(-39.37,-19.68) C10(-39.37,-177.17) D2(-59.06,-19.68) D5(-59.06,-78.74) D6(-59.06,-98.43) D7(-59.06,-118.11) D8(-59.06,-137.79) D10(-59.06,-177.17) E2(-78.74,-19.68) E4(-78.74,-59.06) E5(-78.74,-78.74) E6(-78.74,-98.43) E7(-78.74,-118.11) E8(-78.74,-137.79) E10(-78.74,-177.17) F2(-98.43,-19.68) F4(-98.43,-59.06) F5(-98.43,-78.74) F6(-98.43,-98.43) F7(-98.43,-118.11) F8(-98.43,-137.79) F10(-98.43,-177.17) G2(-118.11,-19.68) G4(-118.11,-59.06) G5(-118.11,-78.74) G6(-118.11,-98.43) G7(-118.11,-118.11) G8(-118.11,-137.79) G10(-118.11,-177.17) H2(-137.8,-19.68) H4(-137.8,-59.06) H5(-137.8,-78.74) H6(-137.8,-98.43) H7(-137.8,-118.11) H8(-137.8,-137.79) H10(-137.8,-177.17) J2(-157.48,-19.68) J10(-157.48,-177.17) K2(-177.17,-19.68) K3(-177.17,-39.37) K4(-177.17,-59.06) K5(-177.17,-78.74) K6(-177.17,-98.43) K7(-177.17,-118.11) K8(-177.17,-137.79) K9(-177.17,-157.48) K10(-177.17,-177.17) L1(-196.85,0) L11(-196.85,-196.85)
  oval 10x6 smd: A3(0,-39.37) A4(0,-59.06) A8(0,-137.79) A9(0,-157.48) L2(-196.85,-19.68) L3(-196.85,-39.37) L4(-196.85,-59.06) L5(-196.85,-78.74) L6(-196.85,-98.43) L7(-196.85,-118.11)
  oval 10x8 smd: A6(0,-98.43) A7(0,-118.11) L8(-196.85,-137.79) L9(-196.85,-157.48) L10(-196.85,-177.17)
  oval 6x10 smd: B1(-19.69,0) C1(-39.37,0)
  oval 8x10 smd: B11(-19.69,-196.85) C11(-39.37,-196.85) D1(-59.06,0) D11(-59.06,-196.85) E1(-78.74,0) E11(-78.74,-196.85) F1(-98.43,0) F11(-98.43,-196.85) G1(-118.11,0) G11(-118.11,-196.85) H1(-137.8,0) H11(-137.8,-196.85) J1(-157.48,0) J11(-157.48,-196.85) K1(-177.17,0) K11(-177.17,-196.85)
  silkscreen extent -217,-219 18,17
BGA2 [mil]
  round 10 smd: A1(-0.11,0.22) A2(17.96,0.22) A3(36.04,0.22) A4(54.11,0.22) A23(397.53,0.22) AA2(17.96,-361.27) AA22(379.45,-361.27) AB2(17.96,-379.35) AB3(36.04,-379.35) AB4(54.11,-379.35) AB5(72.18,-379.35) AB6(90.26,-379.35) AB7(108.33,-379.35) AB8(126.41,-379.35) AB9(144.48,-379.35) AB10(162.56,-379.35) AB11(180.63,-379.35) AB12(198.71,-379.35) AB13(216.78,-379.35) AB14(234.86,-379.35) AB15(252.93,-379.35) AB16(271,-379.35) AB17(289.08,-379.35) AB18(307.15,-379.35) AB19(325.23,-379.35) AB20(343.3,-379.35) AB21(361.38,-379.35) AB22(379.45,-379.35) AC1(-0.11,-397.42) AC23(397.53,-397.42) B1(-0.11,-17.85) B2(17.96,-17.85) B3(36.04,-17.85) B4(54.11,-17.85) B5(72.18,-17.85) B6(90.26,-17.85) B7(108.33,-17.85) B8(126.41,-17.85) B9(144.48,-17.85) B10(162.56,-17.85) B11(180.63,-17.85) B12(198.71,-17.85) B13(216.78,-17.85) B14(234.86,-17.85) B15(252.93,-17.85) B16(271,-17.85) B17(289.08,-17.85) B18(307.15,-17.85) B19(325.23,-17.85) B20(343.3,-17.85) B21(361.38,-17.85) B22(379.45,-17.85) C2(17.96,-35.93) C22(379.45,-35.93) D1(-0.11,-54) D2(17.96,-54) D4(45.07,-44.68) D5(70.66,-44.68) D6(96.25,-44.68) D8(121.85,-44.68) D9(147.44,-44.68) D11(173.03,-44.68) D12(198.62,-44.68) D13(224.21,-44.68) D15(249.8,-44.68) D16(275.39,-44.68) D18(300.98,-44.68) D19(326.57,-44.68) D20(352.16,-44.68) D22(379.45,-54) E2(17.96,-72.08) E4(45.07,-70.27) E5(70.66,-70.27) E6(96.25,-70.27) E8(121.85,-70.27) E9(147.44,-70.27) E11(173.03,-70.27) E12(198.62,-70.27) E13(224.21,-70.27) E15(249.8,-70.27) E16(275.39,-70.27) E18(300.98,-70.27) E19(326.57,-70.27) E20(352.16,-70.27) E22(379.45,-72.08) F2(17.96,-90.15) F4(45.07,-95.86) F5(70.66,-95.86) F6(96.25,-95.86) F8(121.85,-95.86) F9(147.44,-95.86) F11(173.03,-95.86) F12(198.62,-95.86) F13(224.21,-95.86) F15(249.8,-95.86) F16(275.39,-95.86) F18(300.98,-95.86) F19(326.57,-95.86) F20(352.16,-95.86) F22(379.45,-90.15) G1(-0.11,-108.22) G2(17.96,-108.22) G22(379.45,-108.22) H2(17.96,-126.3) H4(45.07,-121.45) H5(70.66,-121.45) H6(96.25,-121.45) H8(121.85,-121.45) H9(147.44,-121.45) H11(173.03,-121.45) H12(198.62,-121.45) H13(224.21,-121.45) H15(249.8,-121.45) H16(275.39,-121.45) H18(300.98,-121.45) H19(326.57,-121.45) H20(352.16,-121.45) H22(379.45,-126.3) J1(-0.11,-144.38) J2(17.96,-144.38) J4(45.07,-147.04) J5(70.66,-147.04) J6(96.25,-147.04) J8(121.85,-147.04) J9(147.44,-147.04) J11(173.03,-147.04) J12(198.62,-147.04) J13(224.21,-147.04) J15(249.8,-147.04) J16(275.39,-147.04) J18(300.98,-147.04) J19(326.57,-147.04) J20(352.16,-147.04) J22(379.45,-144.38) K2(17.96,-162.45) K22(379.45,-162.45) L1(-0.11,-180.53) L2(17.96,-180.53) L4(45.07,-172.63) L5(70.66,-172.63) L6(96.25,-172.63) L8(121.85,-172.63) L9(147.44,-172.63) L11(173.03,-172.63) L12(198.62,-172.63) L13(224.21,-172.63) L15(249.8,-172.63) L16(275.39,-172.63) L18(300.98,-172.63) L19(326.57,-172.63) L20(352.16,-172.63) L22(379.45,-180.53) M1(-0.11,-198.6) M2(17.96,-198.6) M4(45.07,-198.22) M5(70.66,-198.22) M6(96.25,-198.22) M8(121.85,-198.22) M9(147.44,-198.22) M11(173.03,-198.22) M12(198.62,-198.22) M13(224.21,-198.22) M15(249.8,-198.22) M16(275.39,-198.22) M18(300.98,-198.22) M19(326.57,-198.22) M20(352.16,-198.22) M22(379.45,-198.6) N2(17.96,-216.67) N4(45.07,-223.81) N5(70.66,-223.81) N6(96.25,-223.81) N8(121.85,-223.81) N9(147.44,-223.81) N11(173.03,-223.81) N12(198.62,-223.81) N13(224.21,-223.81) N15(249.8,-223.81) N16(275.39,-223.81) N18(300.98,-223.81) N19(326.57,-223.81) N20(352.16,-223.81) N22(379.45,-216.67) P2(17.96,-234.75) P22(379.45,-234.75) R2(17.96,-252.82) R4(45.07,-249.4) R5(70.66,-249.4) R6(96.25,-249.4) R8(121.85,-249.4) R9(147.44,-249.4) R11(173.03,-249.4) R12(198.62,-249.4) R13(224.21,-249.4) R15(249.8,-249.4) R16(275.39,-249.4) R18(300.98,-249.4) R19(326.57,-249.4) R20(352.16,-249.4) R22(379.45,-252.82) T2(17.96,-270.9) T4(45.07,-274.99) T5(70.66,-274.99) T6(96.25,-274.99) T8(121.85,-274.99) T9(147.44,-274.99) T11(173.03,-274.99) T12(198.62,-274.99) T13(224.21,-274.99) T15(249.8,-274.99) T16(275.39,-274.99) T18(300.98,-274.99) T19(326.57,-274.99) T20(352.16,-274.99) T22(379.45,-270.9) U2(17.96,-288.97) U22(379.45,-288.97) V2(17.96,-307.05) V4(45.07,-300.58) V5(70.66,-300.58) V6(96.25,-300.58) V8(121.85,-300.58) V9(147.44,-300.58) V11(173.03,-300.58) V12(198.62,-300.58) V13(224.21,-300.58) V15(249.8,-300.58) V16(275.39,-300.58) V18(300.98,-300.58) V19(326.57,-300.58) V20(352.16,-300.58) V22(379.45,-307.05) W2(17.96,-325.12) W4(45.07,-326.17) W5(70.66,-326.17) W6(96.25,-326.17) W8(121.85,-326.17) W9(147.44,-326.17) W11(173.03,-326.17) W12(198.62,-326.17) W13(224.21,-326.17) W15(249.8,-326.17) W16(275.39,-326.17) W18(300.98,-326.17) W19(326.57,-326.17) W20(352.16,-326.17) W22(379.45,-325.12) Y2(17.96,-343.2) Y4(45.07,-351.76) Y5(70.66,-351.76) Y6(96.25,-351.76) Y8(121.85,-351.76) Y9(147.44,-351.76) Y11(173.03,-351.76) Y12(198.62,-351.76) Y13(224.21,-351.76) Y15(249.8,-351.76) Y16(275.39,-351.76) Y18(300.98,-351.76) Y19(326.57,-351.76) Y20(352.16,-351.76) Y22(379.45,-343.2)
  oval 8x10 smd: A5(72.18,0.22) A6(90.26,0.22) A8(126.41,0.22)
  oval 6x10 smd: A7(108.33,0.22) A9(144.48,0.22) A10(162.56,0.22) A11(180.63,0.22) A12(198.71,0.22) A13(216.78,0.22) A14(234.86,0.22) A15(252.93,0.22) A16(271,0.22) A17(289.08,0.22) A18(307.15,0.22) A19(325.23,0.22) A20(343.3,0.22) A21(361.38,0.22) A22(379.45,0.22) AC2(17.96,-397.42) AC3(36.04,-397.42) AC4(54.11,-397.42) AC5(72.18,-397.42) AC6(90.26,-397.42) AC7(108.33,-397.42) AC8(126.41,-397.42) AC9(144.48,-397.42) AC10(162.56,-397.42) AC11(180.63,-397.42) AC12(198.71,-397.42) AC13(216.78,-397.42) AC14(234.86,-397.42) AC15(252.93,-397.42) AC16(271,-397.42) AC17(289.08,-397.42) AC18(307.15,-397.42) AC19(325.23,-397.42) AC20(343.3,-397.42) AC21(361.38,-397.42) AC22(379.45,-397.42)
  oval 10x8 smd: AA1(-0.11,-361.27) AB1(-0.11,-379.35) C1(-0.11,-35.93) E1(-0.11,-72.08) F1(-0.11,-90.15) P1(-0.11,-234.75) V1(-0.11,-307.05) W1(-0.11,-325.12) Y1(-0.11,-343.2)
  oval 10x6 smd: AA23(397.53,-361.27) AB23(397.53,-379.35) B23(397.53,-17.85) C23(397.53,-35.93) D23(397.53,-54) E23(397.53,-72.08) F23(397.53,-90.15) G23(397.53,-108.22) H1(-0.11,-126.3) H23(397.53,-126.3) J23(397.53,-144.38) K1(-0.11,-162.45) K23(397.53,-162.45) L23(397.53,-180.53) M23(397.53,-198.6) N1(-0.11,-216.67) N23(397.53,-216.67) P23(397.53,-234.75) R1(-0.11,-252.82) R23(397.53,-252.82) T1(-0.11,-270.9) T23(397.53,-270.9) U1(-0.11,-288.97) U23(397.53,-288.97) V23(397.53,-307.05) W23(397.53,-325.12) Y23(397.53,-343.2)
  silkscreen extent -16,-416 415,14
DFN6 [mil]
  rect 18x15 smd: 1(0,0) 2(0,25) 3(0,50) 4(-72.64,50) 5(-72.64,25) 6(-72.64,0)
  rect 26x15 smd: 7(-37.01,55.61)
  rect 40x47 smd: 8(-37.01,14.47)
  silkscreen extent -74,-25 32,66
DFN8 [mil]
  rect 17x48 smd: 0(-28.35,23.33)
  rect 26x8 smd: 1(0,0) 2(0,15.75) 3(0,31.5) 4(0,47.24) 5(-57.09,47.24) 6(-57.09,31.5) 7(-57.09,15.75) 8(-57.09,0)
  silkscreen extent -54,-18 18,-8
QFN32 [mil]
  rect 146x146 smd: 0(69.49,94.98)
  rect 12x25 smd: 1(0,0) 2(19.68,0) 3(39.37,0) 4(59.06,0) 5(78.74,0) 6(98.43,0) 7(118.11,0) 8(137.79,0) 17(137.79,189.27) 18(118.11,189.27) 19(98.43,189.27) 20(78.74,189.27) 21(59.06,189.27) 22(39.37,189.27) 23(19.68,189.27) 24(0,189.27)
  rect 25x12 smd: 9(164.27,25.98) 10(164.27,45.67) 11(164.27,65.35) 12(164.27,85.04) 13(164.27,104.72) 14(164.27,124.41) 15(164.27,144.09) 16(164.27,163.78) 25(-25,163.78) 26(-25,144.09) 27(-25,124.41) 28(-25,104.72) 29(-25,85.04) 30(-25,65.35) 31(-25,45.67) 32(-25,25.98)
  silkscreen extent -33,-24 170,192
SMD [mil]
  rect 40x12 smd: 1(0,0) 2(0,-19.69) 3(0,-39.37) 4(0,-59.06) 5(0,-78.74) 6(0,-98.43) 7(0,-118.11) 8(0,-137.8) 9(0,-157.48) 10(0,-177.17) 11(0,-196.85) 12(0,-216.54) 13(0,-236.22) 14(0,-255.91) 15(0,-275.59) 16(0,-295.28) 17(0,-314.96) 18(0,-334.65) 19(0,-354.33) 20(0,-374.02)
  rect 49x79 smd: 21(105.22,-464.67) 22(105.22,90.75)
  silkscreen extent -50,-479 69,107
SMD-CON#1 [mil]
  oval 51x104 all layers, no hole: 1(-272.93,228.06) 2(67.22,228.06)
  oval 58x102 / inner oval 45x92 / far side oval 58x102 all layers, no hole: 3(-274.11,27.95) 6(66.44,27.95)
  oval 75x52 / inner oval 65x40 / far side oval 75x52 all layers, no hole: 4(-263.39,51.87)
  oval 70x52 / inner oval 65x40 / far side oval 70x52 all layers, no hole: 5(56,51.87)
  rect 10x36 smd: A1(0,0) A2(-19.68,0) A3(-39.37,0) A4(-59.06,0) A5(-78.74,0) A6(-98.42,0) A7(-118.11,0) A8(-137.79,0) A9(-157.48,0) A10(-177.17,0) A11(-196.85,0) A12(-216.54,0)
  rect 10x30 smd: B1(-206.69,62.7) B2(-187.01,62.7) B3(-167.32,62.7) B4(-147.64,62.7) B5(-127.95,62.7) B6(-108.27,62.7) B7(-88.58,62.7) B8(-68.9,62.7) B9(-49.21,62.7) B10(-29.53,62.7) B11(-9.84,62.7) B12(9.84,62.7)
  KeepOutLayer circle w4: c39.27,106.3 r14.79
  KeepOutLayer lines w4: -262.4,103.74 ccw(c-252.56,103.74) -252.56,93.9 -237.99,93.9 ccw(c-237.99,103.74) -228.15,103.74 -228.15,105.9 ccw(c-237.99,105.9) -237.99,115.75 -252.56,115.75 ccw(c-252.56,105.91) -262.4,105.91 -262.4,103.74
  silkscreen extent -284,-9 74,164
SMD-CON#2 [mil]
  oval 51x104 all layers, no hole: 1(-272.93,228.06) 2(67.22,228.06)
  oval 58x102 / inner oval 55x100 / far side oval 58x102 all layers, no hole: 3(-274.11,27.95) 6(66.44,27.95)
  oval 75x52 / inner oval 70x50 / far side oval 75x52 all layers, no hole: 4(-263.39,51.87)
  oval 70x52 / inner oval 70x50 / far side oval 70x52 all layers, no hole: 5(56,51.87)
  rect 10x36 smd: A1(0,0) A2(-19.68,0) A3(-39.37,0) A4(-59.06,0) A5(-78.74,0) A6(-98.43,0) A7(-118.11,0) A8(-137.8,0) A9(-157.48,0) A10(-177.17,0) A11(-196.85,0) A12(-216.54,0)
  rect 10x30 smd: B1(-206.69,62.7) B2(-187.01,62.7) B3(-167.32,62.7) B4(-147.64,62.7) B5(-127.95,62.7) B6(-108.27,62.7) B7(-88.58,62.7) B8(-68.9,62.7) B9(-49.21,62.7) B10(-29.53,62.7) B11(-9.84,62.7) B12(9.84,62.7)
  KeepOutLayer circle w4: c39.27,106.3 r14.79
  KeepOutLayer lines w4: -262.4,103.74 ccw(c-252.56,103.74) -252.56,93.9 -237.99,93.9 ccw(c-237.99,103.74) -228.15,103.74 -228.15,105.91 ccw(c-237.99,105.91) -237.99,115.75 -252.56,115.75 ccw(c-252.56,105.91) -262.4,105.91 -262.4,103.74
  silkscreen extent -284,-9 74,164
SMDJ1 [mil]
  rect 15x58 smd: 1(0,0) 3(-19.68,0) 5(-39.37,0) 7(-59.06,0) 9(-78.74,0) 11(-98.42,0) 13(-118.11,0) 15(-137.79,0) 17(-157.48,0) 19(-177.17,0) 21(-196.85,0) 23(-216.54,0) 25(-236.22,0) 27(-255.91,0) 29(-275.59,0) 31(-295.28,0) 33(-314.96,0) 35(-334.65,0) 37(-354.33,0) 39(-374.02,0) 41(-393.7,0) 43(-413.39,0) 45(-433.07,0) 47(-452.76,0) 49(-472.44,0) 51(-492.13,0) 53(-511.81,0) 55(-531.5,0) 57(-551.18,0) 67(-649.61,0) 69(-669.29,0) 71(-688.98,0) 73(-708.66,0) 75(-728.35,0)
SMDJ2 [mil]
  rect 15x76 smd: 2(0,0) 4(-19.68,0) 6(-39.37,0) 8(-59.06,0) 10(-78.74,0) 12(-98.43,0) 14(-118.11,0) 16(-137.79,0) 18(-157.48,0) 20(-177.17,0) 22(-196.85,0) 24(-216.54,0) 26(-236.22,0) 28(-255.9,0) 30(-275.59,0) 32(-295.28,0) 34(-314.96,0) 36(-334.64,0) 38(-354.33,0) 40(-374.01,0) 42(-393.7,0) 44(-413.39,0) 46(-433.07,0) 48(-452.75,0) 50(-472.44,0) 52(-492.12,0) 54(-511.81,0) 56(-531.5,0) 58(-551.18,0) 68(-649.61,0) 70(-669.29,0) 72(-688.98,0) 74(-708.66,0)
SOD12 [mil]
  rect 45x45 smd: 1(0,0) 2(0,-109.84)
  silkscreen extent -40,-140 35,-5
SOD882#1 [mil]
  rect 10x10 smd: 1(0,0) 2(-17.72,0)
  silkscreen extent -26,-18 -26,-16
SOD882#2 [mil]
  rect 10x10 smd: 1(0,0) 2(17.72,0)
  silkscreen extent 26,16 26,18
SOP8 [mil]
  oval 76x24 smd: 1(0,0) 2(0,50) 3(0,100) 4(0,150) 5(-208.86,150) 6(-208.86,100) 7(-208.86,50) 8(-208.86,0)
  silkscreen extent -187,-36 17,175

## Part data
C1 C2 C3 C4 C5 C6 C7 C8 C9 C10 C11 C12 C13 C14 C15 C16 C17 C18 C19 C20 C21 C22 C23 C24 C25 C26 C27 C28 C29 C30 C31 C32 C33 C34 C35 C36 C37 C38 C39 C200 C201 C202 C203 C204 C205 C206 C207 C208 C209 C210 C211 C212 C213 C214 C215 C216 C217 C218 C219 C220 CB1 CB2 CB3 CB4 CB5 CB6 CB7 CB8 CB9 CB10 CB11 CB12 CB13 CB14 CB15 CB16 CB17 CB18 CB19 CB20 CB21 CB22 CB23 CB24 CB25 CB26 CB27 CB28 CB29 CB30 CB34 CB35 CB36 CB37 CB38 CB39 CB41 CB50 CB51 CB52 CB53 CB54 CB55 CB56 CB58 CB61 CB64 CB66 CB67 CB68 CB69 CB70 CB72 CB74 CB75 CB76 CB77: library part CAP, "Capacitor"
CON1 CON2: library part USB24+6P/CW/A12-B12*
D1 D2 D3 D4 D5 D6 D7 D8 DB3 DB4 DB5 DB6 DB7 DB8 DB9 DB10: library part DIODE-T, "TVS Diode"
DB1 DB2: library part DI, "Diode"
J1 J2: library part CON80_1
J3 J4: library part CON80_2
JB1: library part CON20, "Connector"
L3 LB1: library part DG
QB1 QB2: library part N8P*_1
R1 R2 R3 R4 R5 R6 R7 R8 R9 R10 R11 R12 R13 R14 R15 R16 R17 R18 R19 R20 R21 R22 R23 R200 R816 RB1 RB2 RB3 RB4 RB5 RB6 RB7 RB8 RB9 RB10 RB11 RB12 RB13 RB14 RB15 RB17 RB18 RB19 RB21 RB23 RB24 RB25 RB26 RB27 RB28 RB29 RB30 RB31 RB32 RB33 RB34: library part RAS
RN1 RN2: library part GEXQ/1-4_2-3
U3: library part BY25Q32BSSIG*
U4: library part CY7C65215-32LTXIT
UB1: library part 8
Y1 YB1: library part CRY4P

## Free pads (board coordinates)
  round 1.016 smd: 1(6.688,33.908) 2(45.565,34.026) 5(5.883,17.083)
  rect 0.305x0.305 smd: 3(24.095,34.691)
  rect 0.305x0.457 smd: 4(27.358,34.608)
  round 1.016 smd far side: 6(5.93,16.881) 7(45.088,33.791) 8(7.563,33.825)
  round 5.461 hole 3.1: 9(7.743,38.368) 10(43.283,38.333) 11(7.775,12.855)

## Via types
v1: diameter 0.343, hole 0.2, TopLayer to BottomLayer, tented both sides, 632 vias
v2: diameter 0.8, hole 0.8, TopLayer to BottomLayer, 112 vias